# Altium PCB nrf_400708.PcbDoc (part 1 of 6)
Units mm, origin at the board's own origin, x right, y up, seen from the top; angles counter-clockwise.
Board outline 117 x 63.5 mm, 4 copper layers (Top Layer, Mid-Layer 1, Mid-Layer 2, Bottom Layer), stack 1.556 mm thick; 226 components, 168 nets, 912 pads, 2002 vias.
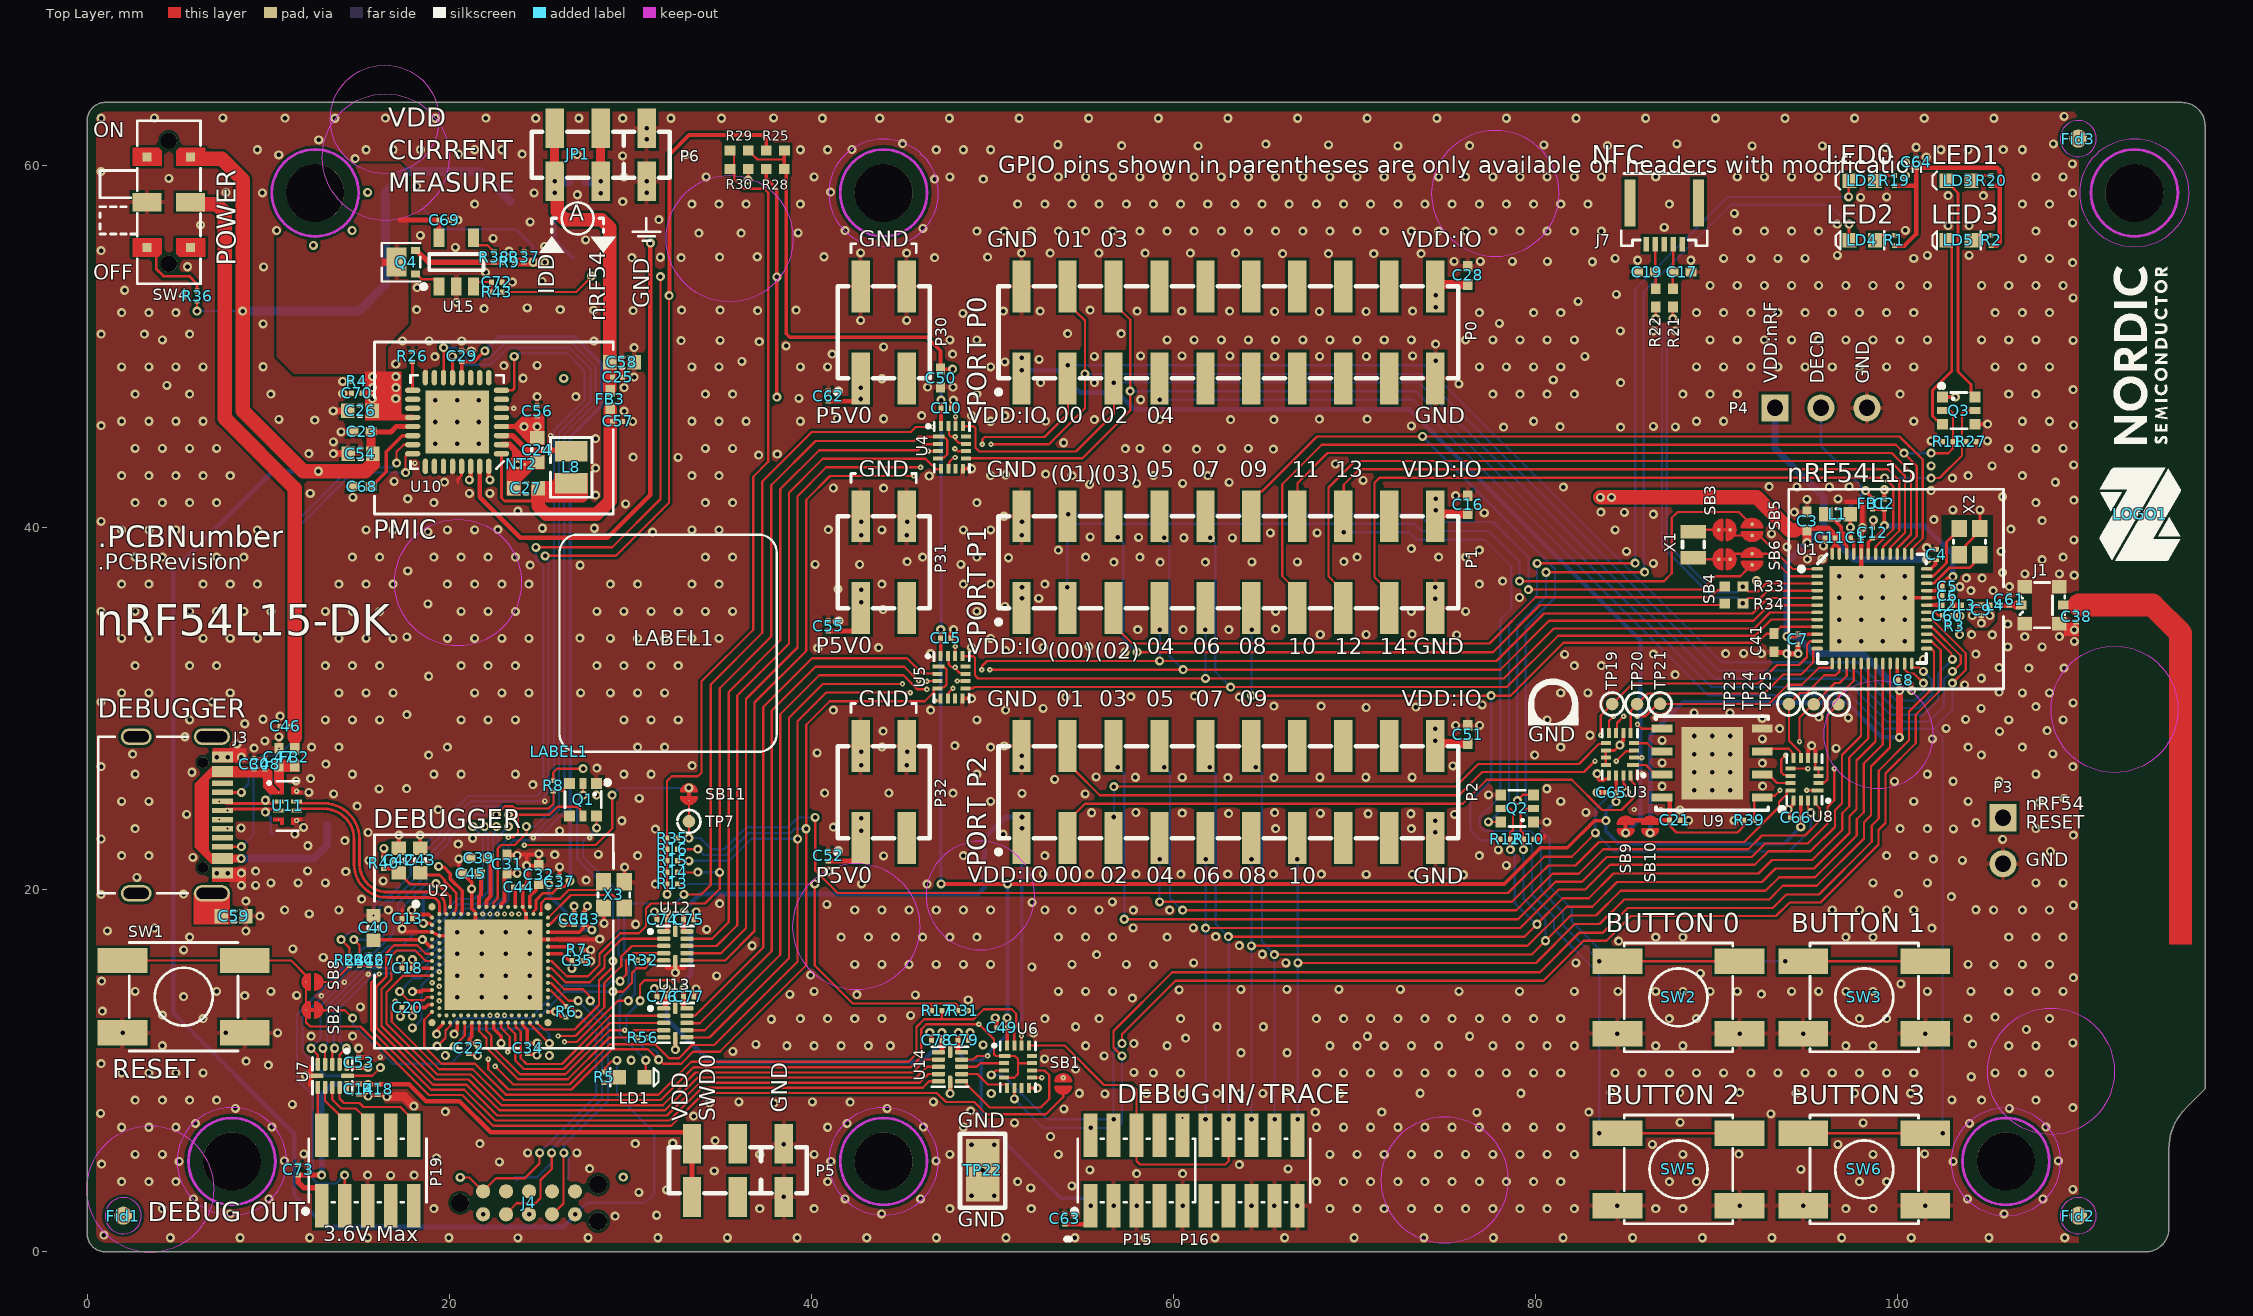
[diagram p0: Top Layer view]
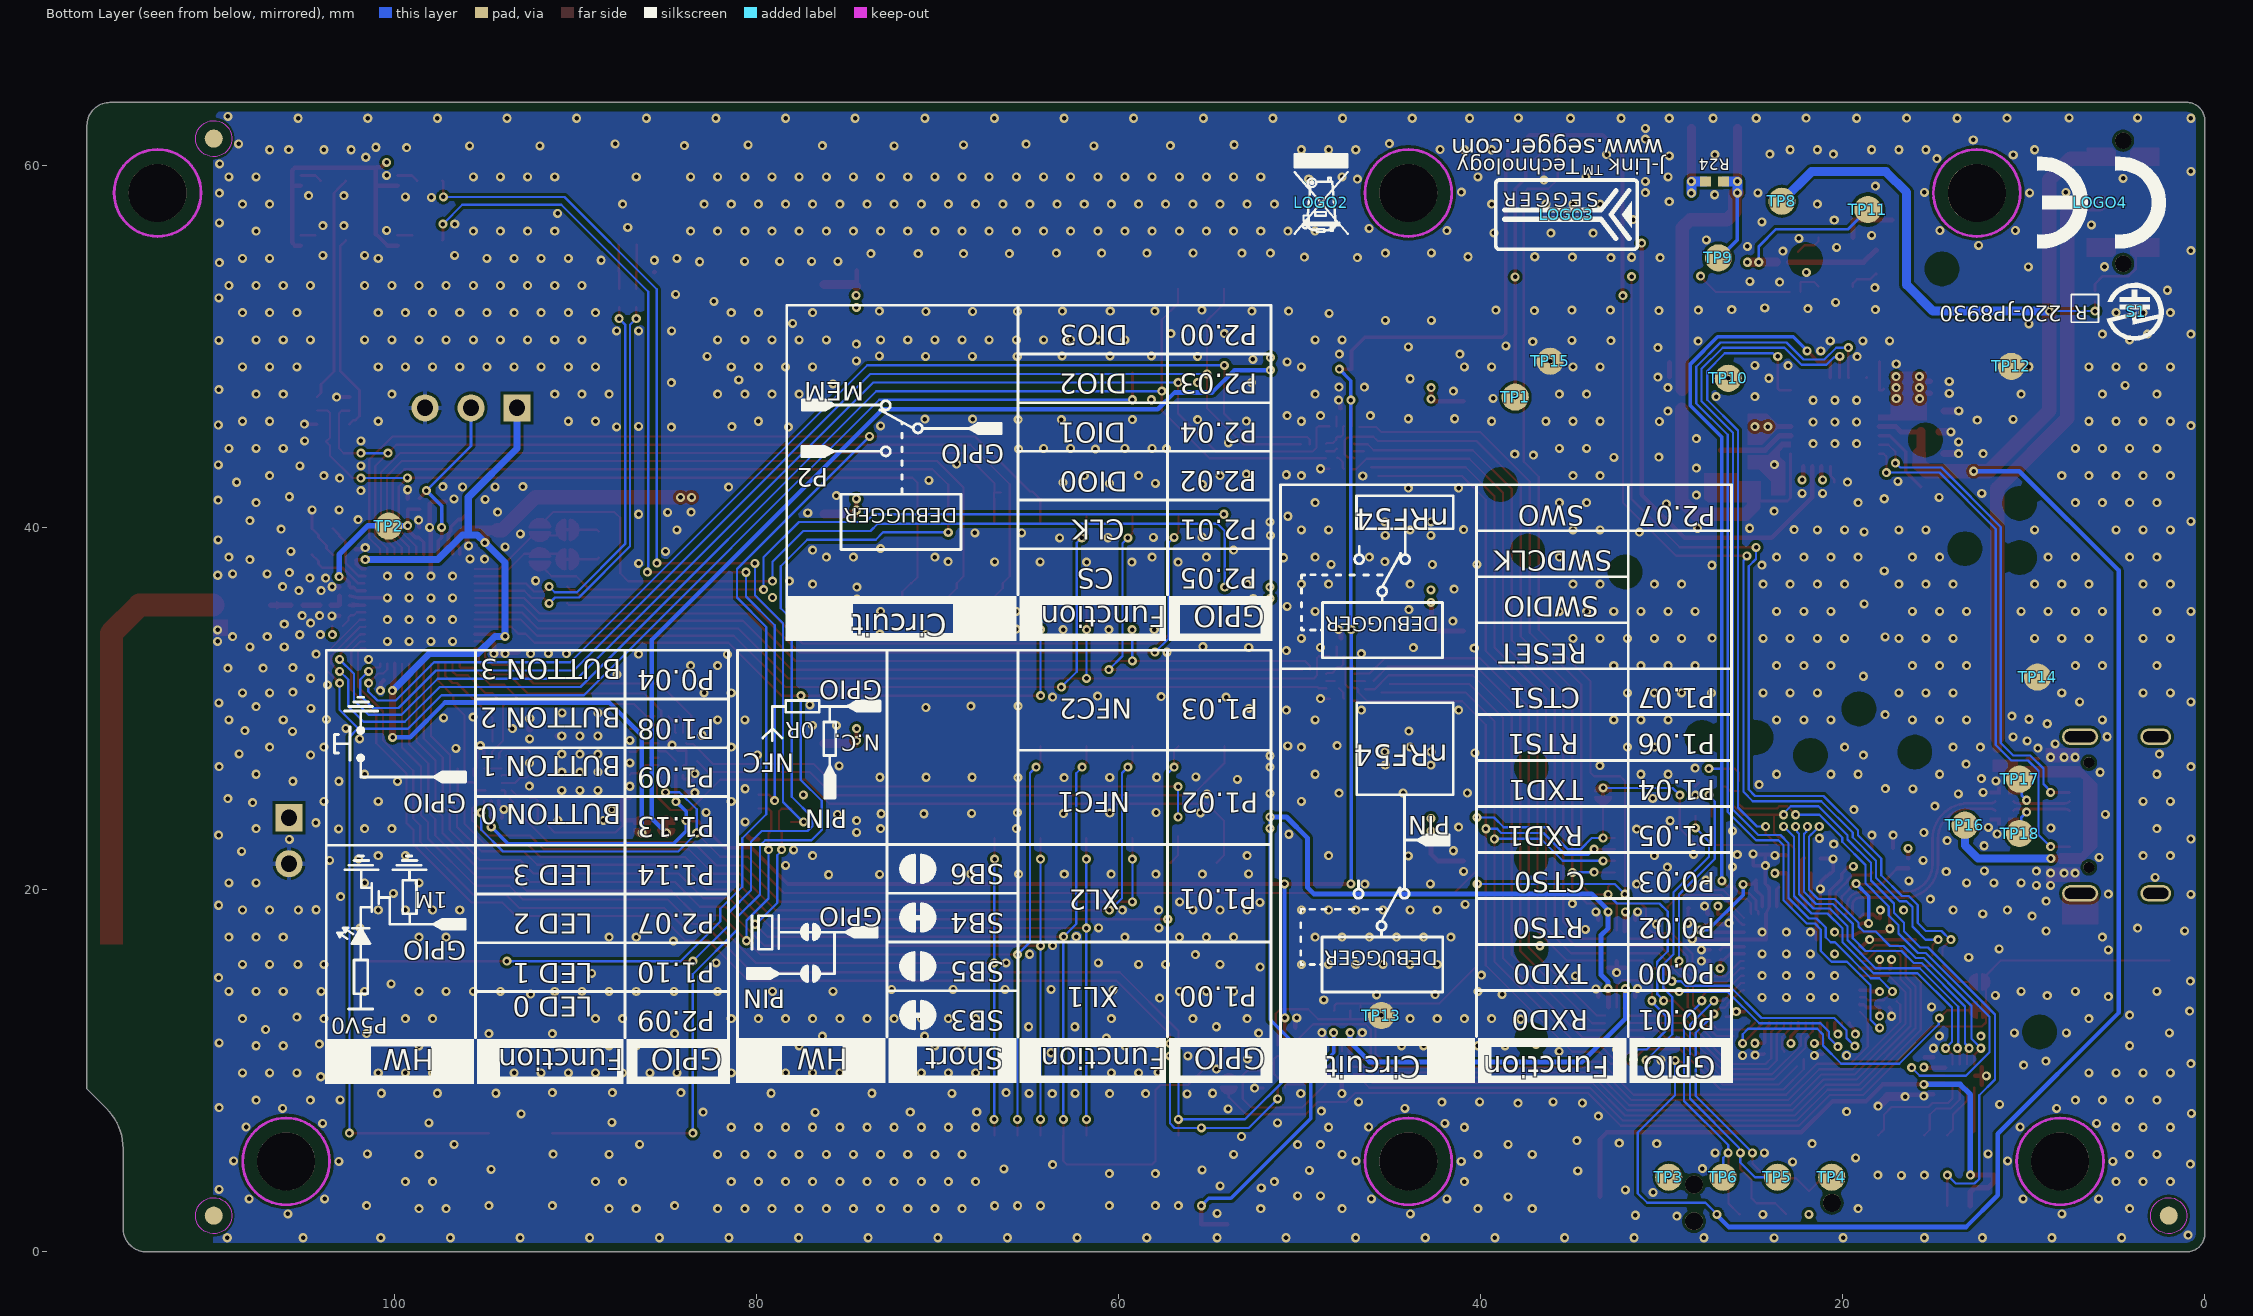
[diagram p1: Bottom Layer view, seen from below]
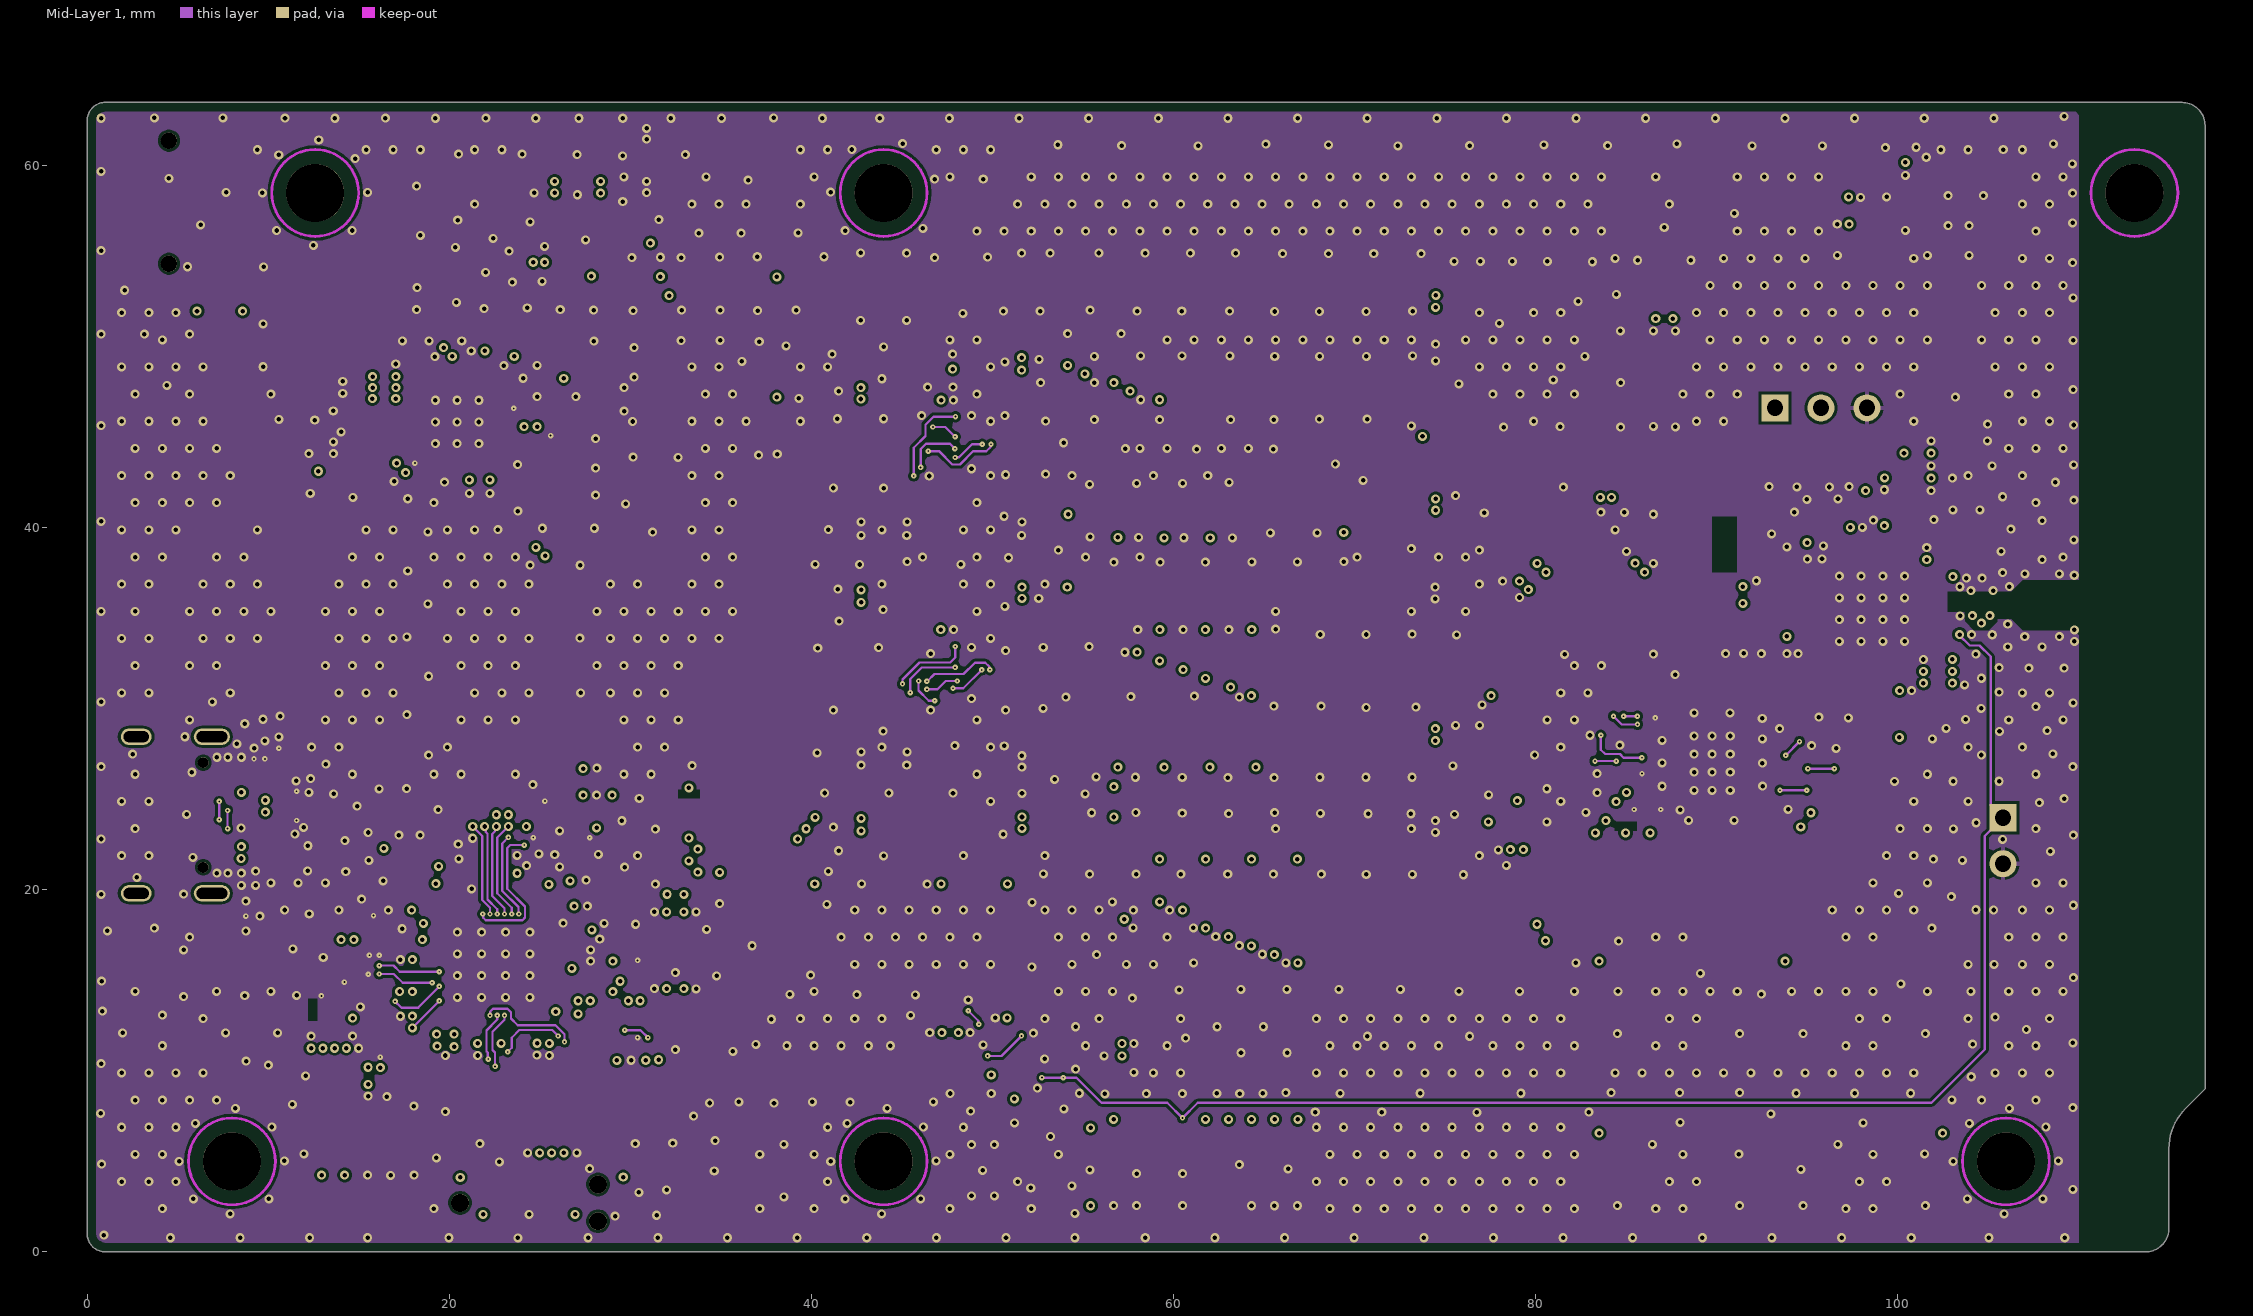
[diagram p2: Mid-Layer 1]
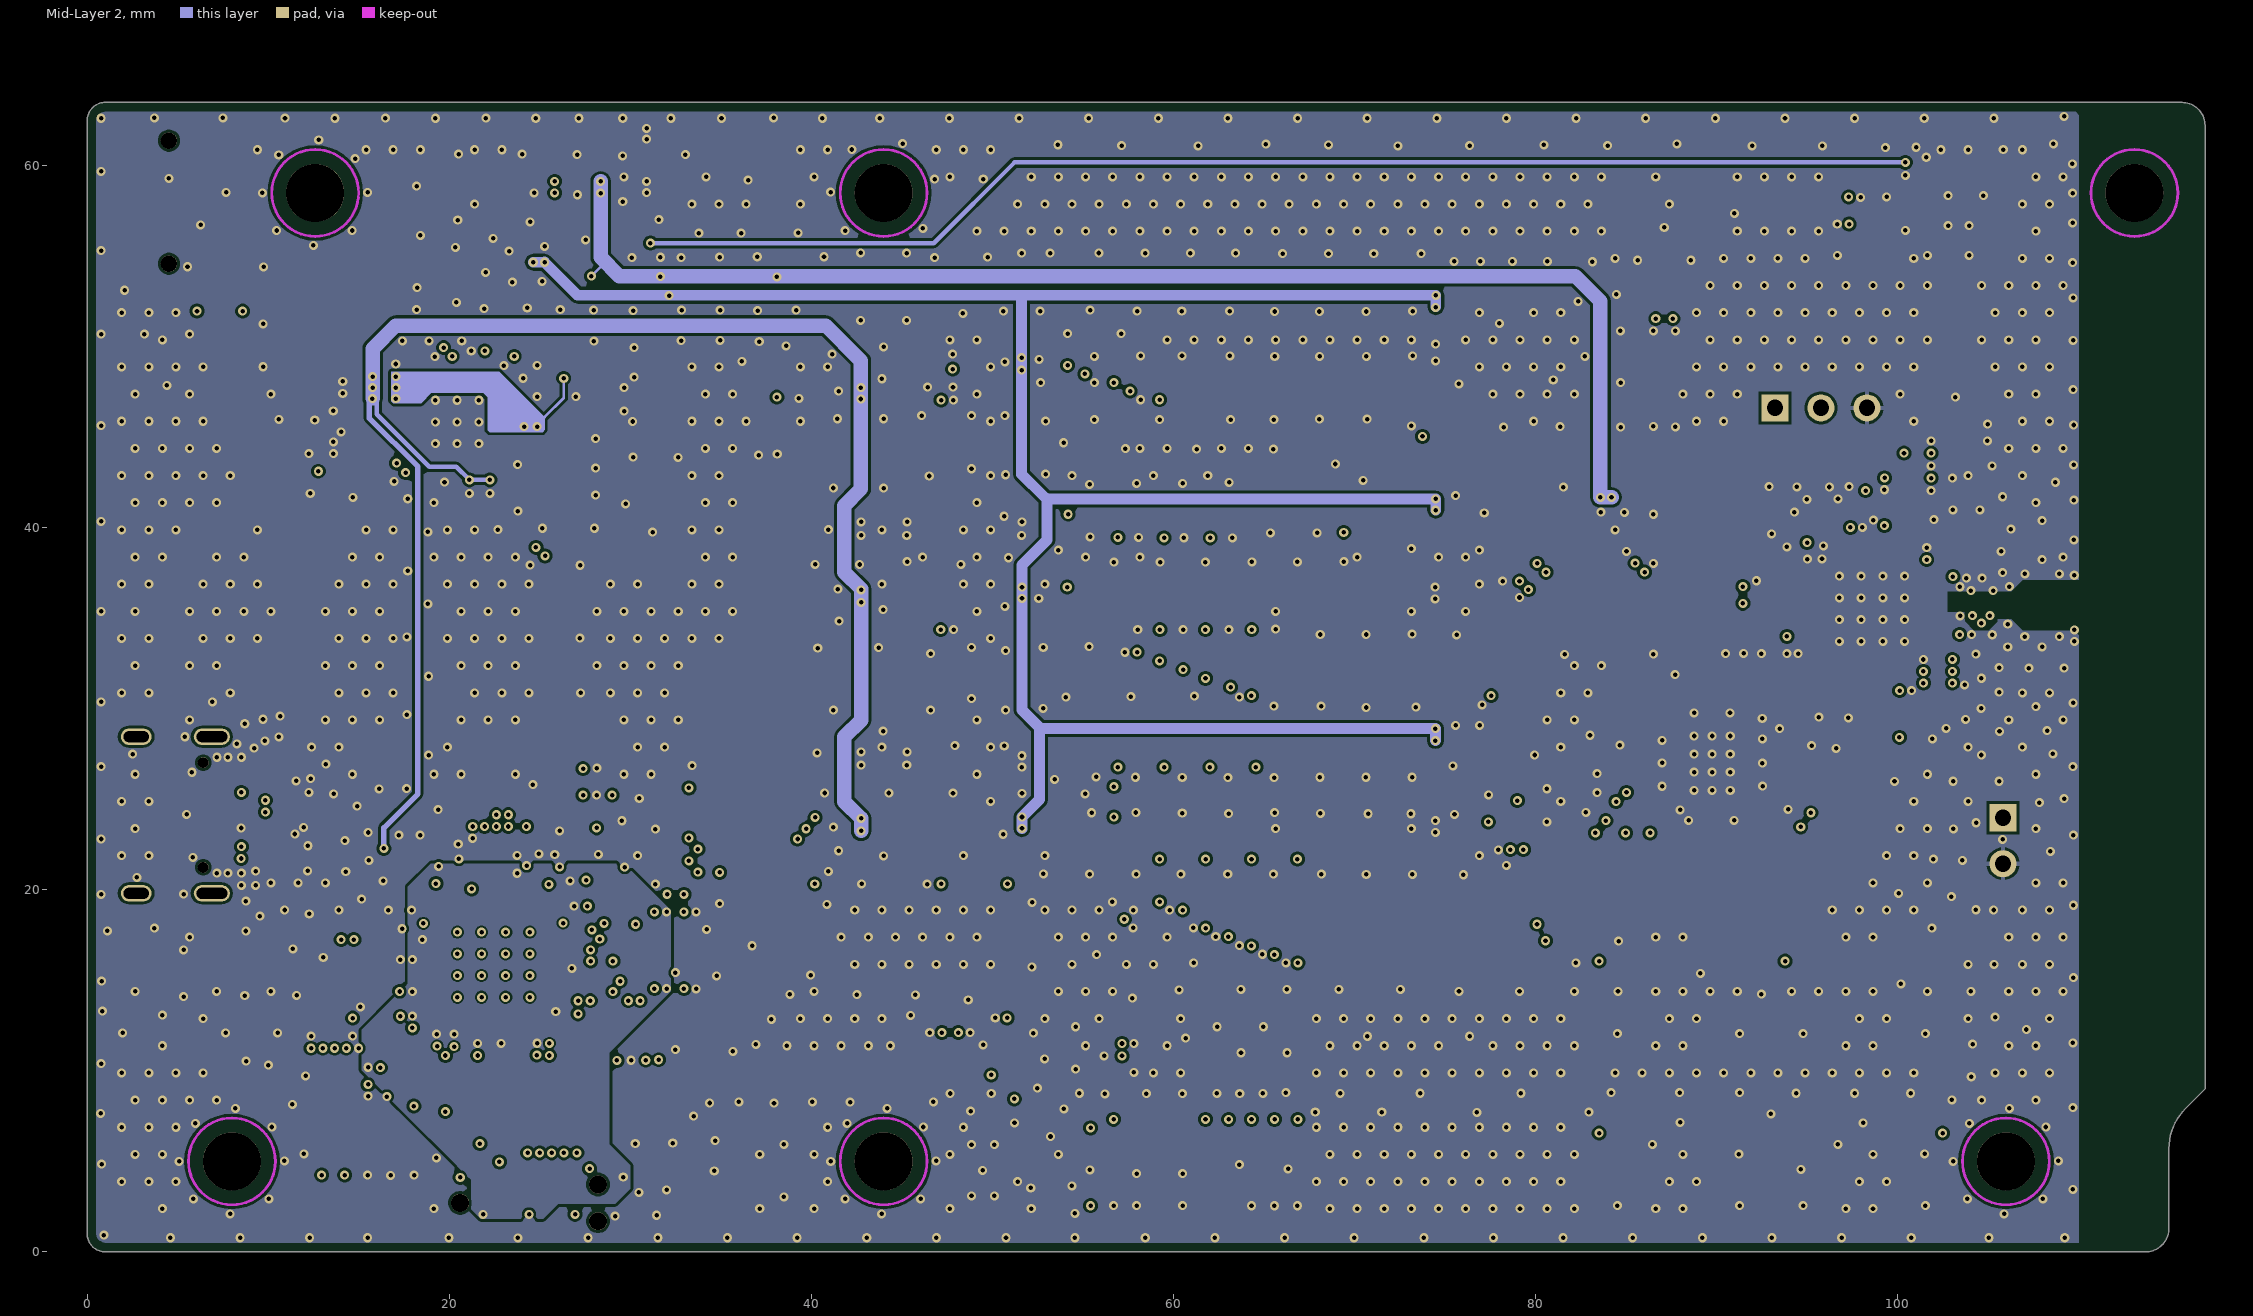
[diagram p3: Mid-Layer 2]
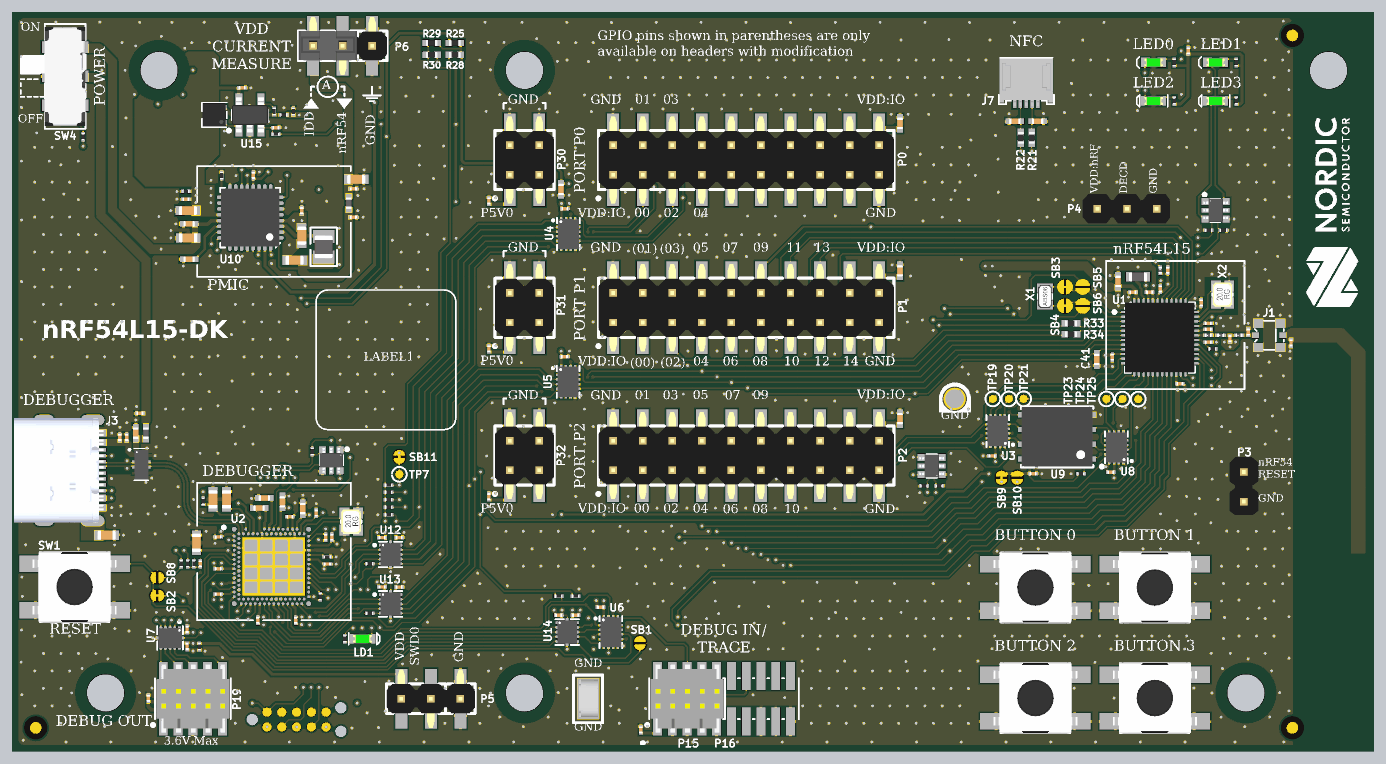
[diagram p7: 3D render of the assembled board from above, using the file's embedded part models]

## Layer stack, top to bottom
Top Solder: solder mask 0.0102, Solder Resist, Dk 3.5
Top Layer: signal copper 0.048
Dielectric 1: prepreg 0.1, PP-021, Dk 4.2
Mid-Layer 1: signal copper 0.03
Dielectric 2: core 1.2, Core-042, Dk 4.2
Mid-Layer 2: signal copper 0.03
Dielectric 3: prepreg 0.1, PP-021, Dk 4.2
Bottom Layer: signal copper 0.048
Bottom Solder: solder mask 0.0102, Solder Resist, Dk 3.5

## Board outline
1.016,0 cw(c1.016,1.016) 0,1.016 0,62.484 cw(c1.016,62.484) 1.016,63.5 115.734,63.5 cw(c115.734,62.23) 117.004,62.23 117.004,9 115.92,7.916 ccw(c118.132,5.705) 115.004,5.705 115.004,1.295 cw(c113.709,1.295) 113.709,0

## Design rules (kind name [scope] priority, off if disabled: settings)
AssemblyTestPointUsage [All] p1 off:
AssemblyTestpoint [All] p1 off: testpointundercomponent=TRUE minsize=1.016 maxsize=2.54 preferedsize=1.524 minholesize=0 maxholesize=1.016 preferedholesize=0.813 testpointgrid=0.025 usegrid=TRUE gridtolerance=0 allowsidetop=TRUE allowsidebottom=TRUE
BoardOutlineClearance [All] p1: gap=0.508 ignorepadtopadclearanceinfootprint=FALSE except(0: Arc-SplitContinuation Track-SplitContinuation SMDPad-SplitContinuation THPad-SplitContinuation Via-SplitContinuation Fill-SplitContinuation Poly-SplitContinuation Region-SplitContinuation Text-SplitContinuation)
Clearance ANT_Clearance [InNet('ANT') or InNet('RF') or InNet('NetC9_2') or InNet('NetC6_2')] p1: gap=0.16 ignorepadtopadclearanceinfootprint=FALSE
Clearance Polygon_Clearance [(InNamedPolygon('Mid_Layer1-GND')) or (InNamedPolygon('Bottom_Layer-GND')) or (InNamedPolygon('Mid_Layer2-GND')) or (InNamedPolygon('Top_Layer-GND'))] p2: gap=0.15 ignorepadtopadclearanceinfootprint=FALSE
Clearance Clearance_IMCU [WithinRoom('nRF5340')] p3: gap=0.1 ignorepadtopadclearanceinfootprint=FALSE
Clearance DiffPair_Clearance [InNetClass('IMCU_USB')] p4: gap=0.127 ignorepadtopadclearanceinfootprint=FALSE
Clearance [All] p5: gap=0.15 ignorepadtopadclearanceinfootprint=FALSE except(0.25: THPad-Region)
ComponentClearance [All] p1 off: gap=0.254 collisioncheckmode=3 verticalgap=0.254 showdistances=FALSE
DiffPairsRouting [InDifferentialPairClass('All Differential Pairs')] p1: maxlimit=0.15 minlimit=0.15 mostfreqgap=0.15 toplayer_minwidth=0.125 toplayer_maxwidth=0.153 toplayer_prefwidth=0.153 midlayer1_minwidth=0.125 midlayer1_maxwidth=0.153 midlayer1_prefwidth=0.125 midlayer4_minwidth=0.125 midlayer4_maxwidth=0.153 midlayer4_prefwidth=0.125 bottomlayer_minwidth=0.125 bottomlayer_maxwidth=0.153 bottomlayer_prefwidth=0.153 maxuncoupledlength=10
FabricationTestPointUsage TestPointUsage [All] p1 off: valid=2 allowmultiple=FALSE
FabricationTestpoint Testpoint [All] p1 off: side=2 testpointundercomponent=TRUE minsize=1.016 maxsize=2.54 preferedsize=1.524 minholesize=0 maxholesize=1.016 preferedholesize=0.813 testpointgrid=2.54 allowsidebottom=TRUE usegrid=TRUE gridtolerance=0
Height [All] p1 off: minheight=0 maxheight=25.4 prefheight=12.7
HoleSize [All] p1: absolutevalues=TRUE maxlimit=5 minlimit=0.1 maxpercent=80.000 minpercent=20.000
HoleToHoleClearance [IsThruVia] p1: gap=0.35 allowstackedmicrovias=FALSE
LayerPairs [All] p1 off: enforce=TRUE
MatchedLengths "Schematic Matched Net Lengths" [InNetClass('TRACE')] p1: tolerance=25.4 checknetsindiffpair=FALSE checkdiffpairvsdiffpair=TRUE checkxsignals=TRUE checkothers=TRUE usedelayunits=TRUE delaytolerance=500.000000
MatchedLengths MatchedLengths-Diffpairs [InDifferentialPairClass('All Differential Pairs')] p2: tolerance=1.27 checknetsindiffpair=TRUE checkdiffpairvsdiffpair=FALSE checkxsignals=FALSE checkothers=FALSE
MinimumAnnularRing [All] p1 off: minimumring=0.1
MinimumSolderMaskSliver [All] p1: minsoldermaskwidth=0.09
NetAntennae [All] p1 off: netantennaetolerance=0.3
PolygonConnect PolygonConnect_TP [HasFootprint('TP_SMD_D1.5mm') vs InNet('GND')] p1: connectstyle=Direct reliefconductorwidth=0.254 reliefentries=4 polygonreliefangle="90 Angle" airgapwidth=0.254
PolygonConnect PolygonConnect_SMT_Pads [HasFootprint('COAXIAL-SWF') or InComponent('C9') or InComponent('C61') or InComponent('TP22') or InComponent('U9') vs InNet('GND')] p2: connectstyle=Direct reliefconductorwidth=0.254 reliefentries=4 polygonreliefangle="90 Angle" airgapwidth=0.254
PolygonConnect [All] p3: thpad.connectstyle=Relief thpad.reliefconductorwidth=0.254 thpad.reliefentries=4 thpad.polygonreliefangle="90 Angle" thpad.airgapwidth=0.15 smdpad.connectstyle=Relief smdpad.reliefconductorwidth=0.254 smdpad.reliefentries=4 smdpad.polygonreliefangle="90 Angle" smdpad.airgapwidth=0.15 via.connectstyle=Direct via.reliefconductorwidth=0.254 via.reliefentries=4 via.polygonreliefangle="90 Angle" via.airgapwidth=0.254
RoomDefinition nRF5340 [False vs False] p1: confinementstyle=ConfineIn formatcopy=TRUE lockcomponents=FALSE outline 18.183,19.99 27.124,19.99 27.124,11.213 18.183,11.213
RoutingVias RoutingVias_Blind [IsBlindVia or IsMicroVia] p1: holewidth=0.711 width=1.27 viastyle="Through Hole" minholewidth=0.711 minwidth=1.27 maxholewidth=0.711 maxwidth=1.27 useviatemplates=TRUE viatemplateguid#1={B6F7EE11-84B8-42C4-BDC0-4B8B407402DD} viatemplatename#1=v30h10m0
RoutingVias RoutingVias_thru [IsThruVia] p2: holewidth=0.305 width=0.61 viastyle="Through Hole" minholewidth=0.305 minwidth=0.61 maxholewidth=0.711 maxwidth=1.27 useviatemplates=TRUE viatemplateguid#1={462064FF-42C7-473E-A651-561C1576AFDF} viatemplateguid#2={E64AB874-45CE-4CC8-95DD-841B5CDF8BA9} viatemplatename#1=v50h25m0mx0 viatemplatename#2=v50h25m0mx0(1)
ShortCircuit ShortCircuit_P15_P16 [InComponent('P15') vs InComponent('P16')] p1: allowed=TRUE
ShortCircuit ShortCircuit_PSS [InNet('PVSS1') or InNet('PVSS2') vs InNet('GND')] p2: allowed=TRUE
ShortCircuit [All] p3: allowed=FALSE
SignalStimulus [All] p1: kind=1 level=0 starttime=10.00n stoptime=250.0n periodtime=150.0n
SilkToSilkClearance [All] p1 off: silktosilkclearance=0.254
SilkToSolderMaskClearance SilkscreenOverComponentPads [IsPad] p1 off: minsilkscreentomaskgap=0.254 clearancetoexposedcopper=TRUE
SolderMaskExpansion SolderMaskExpansion_XFDFN40 [HasFootprint('XFDFN40P180X120X40-8M')] p1: expansion=0.02 istentingtop=FALSE
SolderMaskExpansion SolderMaskExpansion_footprints [HasFootprint('UDFN65P200X200X60_HS-6N') or HasFootprint('SON50P300X80-HS-11N') or HasFootprint('US8') or HasFootprint('SON50P300X80_HS-9N') or HasFootprint('BGA25C40P5X5_200X200X50') or HasFootprint('QFN40P180X140X55-10N') or HasFootprint('DX07S016JA1R1500') or HasFootprint('AQFN40P700X700X85_HS-99N') or HasFootprint('Nordic_QFN50P500X500X90-33N') or HasFootprint('QFN12P40_170X200X55L50X20')] p2: expansion=0.03 istentingtop=FALSE
SolderMaskExpansion SolderMaskExpansion_VIA [IsVia] p3: expansion=0.076 istentingtop=TRUE
SolderMaskExpansion [All] p4: expansion=0.05 istentingtop=FALSE
SupplyNets "Schematic Supply Nets" [InNet('VDD:IO')] p1: voltage=0.000
SupplyNets "Schematic Supply Nets_1" [InNet('VBUS')] p2: voltage=0.000
SupplyNets "Schematic Supply Nets_15" [InNet('VDD:SW')] p3: voltage=0.000
SupplyNets "Schematic Supply Nets_14" [InNet('VDD:DBGR')] p4: voltage=0.000
SupplyNets "Schematic Supply Nets_10" [InNet('VDD:SWD0')] p5: voltage=0.000
SupplyNets "Schematic Supply Nets_9" [InNet('VDD:nRF')] p6: voltage=0.000
SupplyNets "Schematic Supply Nets_7" [InNet('VDD:SW_PU')] p7: voltage=0.000
SupplyNets "Schematic Supply Nets_13" [InNet('VDD')] p8: voltage=0.000
SupplyNets "Schematic Supply Nets_12" [InNet('P5V0')] p9: voltage=0.000
SupplyNets "Schematic Supply Nets_11" [InNet('GND')] p10: voltage=0.000
SupplyNets "Schematic Supply Nets_3" [InNet('PVSS1')] p11: voltage=0.000
SupplyNets "Schematic Supply Nets_2" [InNet('VBUSOUT')] p12: voltage=0.000
Width Width_IMCU [OnTopLayer and HasFootprint('BGA144C35P12X12_450X420X100-A8-M3')] p1: maxlimit=2.5 minlimit=0.1 preferedwidth=0.15
Width [All] p2: maxlimit=2.5 minlimit=0.125 preferedwidth=0.15
15 further rules are at their usual default settings.

## Classes and differential pairs
component class Switches: C65 C66 R35 SB11 TP7 TP19 TP20 TP21 TP23 TP24 TP25 U3 U8
net class UART1: P1.04 P1.05 P1.06 P1.07
net class UART0: P0.00 P0.01 P0.02 P0.03
net class SWD_nRF54: nRF54_RESET P2.07 SWDCLK SWDIO
net class QSPI: P2.00_B P2.01_B P2.02_B P2.03_B P2.04_B P2.05_B
net class NFC: P1.02/NFC1 P1.03/NFC2
net class LEDS: P1.10 P1.14 P2.07 P2.09
net class GPIO_P2: P2.00 P2.01 P2.02 P2.03 P2.04 P2.05 P2.06 P2.07 P2.08 P2.09 P2.10
net class GPIO_P1: P1.00 P1.01 P1.02/NFC1 P1.03/NFC2 P1.04 P1.05 P1.06 P1.07 P1.08 P1.09 P1.10 P1.11 P1.12 P1.13 P1.14
net class GPIO_P0: P0.00 P0.01 P0.02 P0.03 P0.04
net class BUTTONS: P0.04 P1.08 P1.09 P1.13
differential pair class DBGR: DBGR DBGR'
net class DBGR_USB: DBGR'_N DBGR'_P DBGR_N DBGR_P
net class TRACE: P2.06 P2.07 P2.08 P2.09 P2.10
component class "Power supply": C23 C24 C25 C26 C27 C29 C56 C57 C58 C68 C69 C70 C72 FB3 JP1 L8 NT2 P6 Q4 R4 R24 R26 R38 R43 TP8 TP9 TP10 TP11 TP12 TP13 TP14 TP15 U10 U15
component class "Levelshifters and switches": C10 C14 C15 C49 C50 C53 C74 C75 C76 C77 C78 C79 R8 R13 R14 R15 R16 R17 R18 R25 R28 R29 R30 R31 U4 U5 U6 U7 U12 U13 U14
component class nRF54L15: C1 C2 C3 C4 C5 C6 C7 C8 C9 C11 C12 C38 C41 C60 C61 FB1 J1 L1 L2 L3 L4 P3 P4 R3 R33 R34 SB3 SB4 SB5 SB6 TP1 TP2 U1 X1 X2
component class Debugger: C13 C18 C20 C22 C31 C32 C33 C34 C35 C36 C37 C39 C40 C42 C43 C44 C45 C67 J4 LD1 Q1 R5 R6 R7 R32 R40 R41 R42 R56 TP3 TP4 TP5 TP6 U2 X3
component class Misc: C17 C19 C21 C64 LD2 LD3 LD4 LD5 Q2 Q3 R1 R2 R10 R11 R12 R19 R20 R21 R22 R23 R27 R39 SB8 SB9 SB10 SW1 SW2 SW3 SW5 SW6 U9
component class Connectors: C16 C28 C30 C46 C47 C48 C51 C52 C54 C55 C59 C62 C63 C73 FB2 J3 J7 P0 P1 P2 P5 P15 P16 P19 P30 P31 P32 R36 SW4 TP16 TP17 TP18 TP22 U11
component class pca10156_sheet1_connections: Fid1 Fid2 Fid3 LABEL1 LOGO1 LOGO2 LOGO3 LOGO4 S1 SB1 SB2
differential pair DBGR: +DBGR_P -DBGR_N
differential pair DBGR': +DBGR'_P -DBGR'_N

## Components (designator, comment, footprint, x,y, rotation, side; value= is the part's Value field where it differs from the comment)
C1 "2.2µF" CAPC0603X03L_C 97.72,39.439 r180 top
C2 "2.2µF" CAPC0603X03L_C 99.294,41.317 r270 top
C3 "10µF" CAPC1005X04L 95.017,40.367 r270 top
C4 "100nF" CAPC0603X03L_C 102.164,38.523 r90 top
C5 "2.2nF" CAPC0603X03L_C 102.773,36.75 r180 top
C6 "1.5pF" CAPC0603X03L_C 102.773,36.25 r0 top
C7 "100nF" CAPC0603X03L_C 94.518,33.849 r270 top
C8 "100nF" CAPC0603X03L_C 100.325,31.575 r0 top
C9 "2.0pF" CAPC0603X03L_C 104.635,35.445 r90 top
C10 "100nF" CAPC0603X03L_C 47.467,46.607 r0 top
C11 "100nF" CAPC0603X03L_C 96.285,39.439 r180 top
C12 "10nF" CAPC0603X03L_C 98.633,39.717 r90 top
C13 "100nF" CAPC0603X03L_C 17.689,18.401 r180 top
C14 "100nF" CAPC0603X03L_C 15.004,8.992 r270 top
C15 "100nF" CAPC0603X03L_C 47.433,33.903 r0 top
C16 "1.0µF" CAPC1005X04L 76.275,41.275 r270 top
C17 "300pF" CAPC1005X04L 88.104,54.123 r0 top
C18 "100nF" CAPC0603X03L_C 17.689,15.659 r180 top
C19 "300pF" CAPC1005X04L 86.152,54.123 r0 top
C20 "100nF" CAPC0603X03L_C 17.689,13.499 r180 top
C21 "100nF" CAPC0603X03L_C 87.707,23.842 r0 top
C22 "100nF" CAPC0603X03L_C 21.092,11.239 r270 top
C23 "2.2µF" CAPC1005X04L 15.184,45.313 r0 top
C24 "10µF" CAPC1608X06L 24.867,44.296 r90 top
C25 "100nF" CAPC0603X03L_C 29.305,48.321 r180 top
C26 "10µF" CAPC1608X06L 15.082,46.456 r0 top
C27 "10µF" CAPC1608X06L 24.249,42.186 r0 top
C28 "1.0µF" CAPC1005X04L 76.275,53.95 r270 top
C29 "100nF" CAPC0603X03L_C 20.7,49.475 r90 top
C30 "10nF" CAPC0603X03L_C 9.225,26.95 r90 top
C31 "1.0µF" CAPC1005X04L 23.2,21.424 r90 top
C32 "1.0µF" CAPC1005X04L 24.953,20.84 r270 top
C33 "2.2nF" CAPC0603X03L_C 27.459,18.376 r90 top
C34 "100nF" CAPC0603X03L_C 24.343,11.239 r270 top
C35 "100nF" CAPC0603X03L_C 27.068,16.078 r0 top
C36 "100nF" CAPC0603X03L_C 26.909,18.376 r270 top
C37 "100nF" CAPC0603X03L_C 26.096,20.459 r90 top
C38 "1.4pF" CAPC0603X03L_C 109.88,35.08 r90 top
C39 "1.0µF" CAPC1005X04L 21.651,21.754 r0 top
C40 "2.2µF" CAPC1608X06L 15.825,17.9 r90 top
C41 "100nF" CAPC1005X04L 93.186,33.655 r90 top
C42 "4.7µF" CAPC1608X06L 17.231,21.627 r90 top
C43 "4.7µF" CAPC1608X06L 18.4,21.627 r90 top
C44 "100nF" CAPC0603X03L_C 23.835,20.154 r0 top
C45 "1.0µF" CAPC1005X04L 21.194,20.891 r0 top
C46 "100nF" CAPC0603X03L_C 10.95,29.025 r0 top
C47 "1.0µF" CAPC1005X04L 10.6,27.325 r270 top
C48 "100nF" CAPC0603X03L_C 9.825,26.95 r270 top
C49 "100nF" CAPC0603X03L_C 50.54,12.369 r180 top
C50 "1.0µF" CAPC1005X04L 47.15,48.269 r90 top
C51 "1.0µF" CAPC1005X04L 76.275,28.576 r270 top
C52 "100nF" CAPC0603X03L_C 40.95,21.875 r270 top
C53 "100nF" CAPC0603X03L_C 15.004,10.459 r270 top
C54 "4.7µF" CAPC1608X06L 15.1,44.1 r180 top
C55 "100nF" CAPC0603X03L_C 40.95,34.575 r270 top
C56 "100nF" CAPC0603X03L_C 24.867,46.446 r270 top
C57 "100nF" CAPC0603X03L_C 29.305,45.874 r180 top
C58 "4.7µF" CAPC1608X06L 29.55,49.139 r0 top
C59 "10nF" CAPC1608X06L 8.1,18.552 r0 top
C60 "3.9pF" CAPC0603X03L_C 102.773,35.149 r0 top
C61 "0.3pF" CAPC0603X03L_C 106.2,36.015 r270 top
C62 "100nF" CAPC0603X03L_C 40.95,47.275 r270 top
C63 "100nF" CAPC0603X03L_C 54,1.825 r270 top
C64 "100nF" CAPC0603X03L_C 101.039,60.185 r270 top
C65 "100nF" CAPC0603X03L_C 84.193,25.365 r180 top
C66 "100nF" CAPC0603X03L_C 94.385,23.971 r180 top
C67 "10nF" CAPC0603X03L_C 16.145,16.1 r90 top
C68 "1.0µF" CAPC1005X04L 15.184,42.275 r0 top
C69 "100nF" CAPC0603X03L_C 19.735,57 r0 top
C70 "100nF" CAPC0603X03L_C 14.9,47.425 r0 top
C72 "100nF" CAPC0603X03L_C 22.635,53.575 r0 top
C73 "100nF" CAPC0603X03L_C 11.679,4.531 r270 top
C74 "100nF" CAPC0603X03L_C 31.766,18.354 r180 top
C75 "100nF" CAPC0603X03L_C 33.233,18.354 r0 top
C76 "100nF" CAPC0603X03L_C 31.766,14.104 r180 top
C77 "100nF" CAPC0603X03L_C 33.233,14.094 r0 top
C78 "100nF" CAPC0603X03L_C 46.939,11.679 r180 top
C79 "100nF" CAPC0603X03L_C 48.395,11.679 r0 top
FB1 "120R/0.2A" INDC0603X03L_C 98.633,41.317 r270 top
FB2 "120R/0.55A" INDC1005X04L 11.475,27.325 r90 top
FB3 "120R/0.55A" INDC1005X04L 28.905,47.096 r90 top
Fid1 "Fiducial mark" Fiducial 2,2 r0 top locked value=N.A.
Fid2 "Fiducial mark" Fiducial 110,2 r0 top locked value=N.A.
Fid3 "Fiducial mark" Fiducial 110,61.5 r0 top locked value=N.A.
J1 "MM8130-2600" COAXIAL-SWF 108.005,35.73 r90 top locked
J3 "USB-C 2.0" SD-80259-001 5.1,24.134 r270 top locked
J4 "TC2050-IDC" TC2050-IDC-NLFP 24.418,2.709 r0 top locked
J7 "FPC 0.5mm RA SMD" FPC_05P-0.5mm-RA-SMD 88.129,55.654 r180 top locked
JP1 "Shunt 2.54mm" Shunt_2.54mm_Vertical 27.113,60.625 r180 top
L1 "4.7µH" INDC1608X06L 96.728,40.758 r180 top
L2 "2.7nH" INDC0603X03L_C 102.773,35.73 r0 top
L3 "3.5nH" INDC0603X03L_C 103.83,35.73 r0 top
L4 "3.5nH" INDC0603X03L_C 105.406,35.73 r0 top
L8 "2.2µH" INDC2016X10N 26.749,43.336 r90 top locked
LABEL1 "12x12mm" LabelSilk_12x12 26.1,27.625 r0 top
LD1 "L0603G" LED_0603_G 30.103,9.652 r180 top
LD2 "L0603G" LED_0603_G 98.07,59.181 r0 top
LD3 "L0603G" LED_0603_G 103.404,59.181 r0 top
LD4 "L0603G" LED_0603_G 98.07,55.879 r0 top locked
LD5 "L0603G" LED_0603_G 103.404,55.879 r0 top locked
LOGO1 "Nordic Logo" NORDIC_LOGO_LYING 113.429,40.75 r90 top
LOGO2 "WEE Symbol" WEE_3x4.5mm 48.823,57.95 r0 bottom
LOGO3 "Segger Logo S" SEGGER_LOGO_S 35.267,57.301 r0 bottom
LOGO4 "CE Logo" CE_logo 5.771,57.97 r0 bottom
NT2 "Net tie" "2 PIN STARPOINT" 23.983,43.502 r180 top net-tie
P0 "Pin Hdr 2x10" HDR_2x10-SMD 63.054,50.8 r0 top
P1 "Pin Hdr 2x10" HDR_2x10-SMD 63.054,38.1 r0 top
P2 "Pin Hdr 2x10" HDR_2x10-SMD 63.054,25.4 r0 top
P3 "Pin List 1x2" LIST_1x2 105.845,22.713 r270 top
P4 "Pin List 1x3" LIST_1x3 95.785,46.625 r0 top locked
P5 "Pin List 1x3" LIST_1x3_SMD 38.5,4.5 r180 top locked
P6 "Pin List 1x3" LIST_1x3_SMD 30.912,60.606 r180 top locked
P15 "Pin Header 2x5, 1.27mm" HDR_2x5-SMD-1.27mm-K 57.978,4.5 r0 top locked
P16 "Pin Header 2x10, 1.27mm" HDR_2x10-SMD-1.27mm-NC 61.153,4.5 r0 top locked
P19 "Pin Header 2x5, 1.27mm" HDR_2x5-SMD-1.27mm-K 15.504,4.5 r0 top locked
P30 "Pin Header 2x2 SMD" HDR_2x2-SMD 44.004,50.8 r0 top
P31 "Pin Header 2x2 SMD" HDR_2x2-SMD 44.004,38.1 r0 top
P32 "Pin Header 2x2 SMD" HDR_2x2-SMD 44.004,25.4 r0 top
Q1 "NX138AKS" TSSOP6 27.401,24.983 r180 top
Q2 "NX138AKS" TSSOP6 79,24.5 r90 top
Q3 "NX138AKS" TSSOP6 103.4,46.475 r270 top
Q4 "PBSS4330PA" DFN105P200X65-3N_v2 17.35,54.675 r180 top
R1 "680R" RESC0603X03L_C 99.848,55.879 r270 top
R2 "680R" RESC0603X03L_C 105.182,55.879 r270 top
R3 "0R" RESC0603X03L_C 103.15,34.575 r0 top
R4 "10k" RESC0603X03L_C 14.9,48.091 r0 top
R5 "560R" RESC0603X03L_C 28.56,9.652 r90 top
R6 "100k" RESC0603X03L_C 26.46,13.271 r270 top
R7 "47R" RESC0603X03L_C 27.06,16.687 r0 top
R8 "100k" RESC0603X03L_C 25.76,25.74 r90 top
R9 "0R" RESC0603X03L_C 23.317,54.674 r0 top
R10 "1M0" RESC0603X03L_C 79.64,22.798 r0 top
R11 "1M0" RESC0603X03L_C 102.796,44.763 r180 top
R12 "1M0" RESC0603X03L_C 78.336,22.792 r180 top
R13 "100k" RESC0603X03L_C 32.325,20.325 r0 top
R14 "100k" RESC0603X03L_C 32.325,20.964 r0 top
R15 "100k" RESC0603X03L_C 32.325,21.605 r0 top
R16 "100k" RESC0603X03L_C 32.325,22.237 r0 top
R17 "100k" RESC0603X03L_C 46.939,13.325 r180 top
R18 "1M0" RESC0603X03L_C 16.064,8.977 r90 top
R19 "680R" RESC0603X03L_C 99.848,59.181 r270 top
R20 "680R" RESC0603X03L_C 105.182,59.181 r270 top
R21 "0R" RESC1005X04L 87.604,52.704 r90 top
R22 "0R" RESC1005X04L 86.661,52.704 r90 top
R23 "100k" RESC0603X03L_C 14.5,16.1 r90 top
R24 "TBD" RESC1005X04L 27.099,59.141 r180 bottom
R25 "0R" RESC1005X04L 38.025,60.85 r0 top
R26 "47k" RESC0603X03L_C 17.973,49.468 r90 top
R27 "1M0" RESC0603X03L_C 104.075,44.763 r0 top
R28 "0R" RESC1005X04L 38.019,59.83 r0 top
R29 "0R" RESC1005X04L 36.025,60.85 r0 top
R30 "0R" RESC1005X04L 36.025,59.83 r0 top
R31 "100k" RESC0603X03L_C 48.395,13.325 r0 top
R32 "100k" RESC0603X03L_C 30.7,16.1 r180 top
R33 "0R" RESC1005X04L 90.974,36.755 r180 top
R34 "0R" RESC1005X04L 90.974,35.83 r180 top
R35 "100k" RESC0603X03L_C 32.325,22.864 r180 top
R36 "1k" RESC0603X03L_C 6.075,52.8 r270 top
R37 "10k" RESC0603X03L_C 24.142,54.96 r270 top
R38 "0R" RESC0603X03L_C 22.485,54.96 r270 top
R39 "100k" RESC0603X03L_C 91.822,23.835 r180 top
R40 "2R2" RESC0603X03L_C 16.394,21.469 r90 top
R41 "10k" RESC0603X03L_C 15.053,16.099 r90 top
R42 "10k" RESC0603X03L_C 15.6,16.099 r270 top
R43 "33k" RESC0603X03L_C 22.635,53.025 r180 top
R56 "100k" RESC0603X03L_C 30.7,11.84 r180 top
S1 "Giteki Symbol" Giteki 3.788,51.95 r0 bottom
SB1 "Solderbridge" Solderbridge 53.925,9.275 r270 top
SB2 "Solderbridge" Solderbridge_Shorted 12.45,13.364 r0 top net-tie
SB3 "Solderbridge" Solderbridge_SHORTED_0.4 90.458,39.887 r180 top net-tie
SB4 "Solderbridge" Solderbridge_SHORTED_0.4 90.458,38.262 r180 top net-tie
SB5 "Solderbridge" Solderbridge_0.4#1 91.982,39.887 r90 top
SB6 "Solderbridge" Solderbridge_0.4#2 91.982,38.262 r270 top
SB8 "Solderbridge" Solderbridge 12.45,14.91 r0 top
SB9 "Solderbridge" Solderbridge_Shorted 84.997,23.492 r90 top net-tie
SB10 "Solderbridge" Solderbridge 86.347,23.492 r90 top
SB11 "Solderbridge" Solderbridge_Shorted 33.25,25.283 r270 top net-tie
SW1 "PB SW" Switch-PB-6.2x6.3mm-SMD 5.338,14.097 r180 top
SW2 "PB SW" Switch-PB-6.2x6.3mm-SMD 87.918,14.058 r180 top locked
SW3 "PB SW" Switch-PB-6.2x6.3mm-SMD 98.179,14.058 r180 top locked
SW4 "Switch" JS102011JAQN 4.521,57.988 r270 top locked
SW5 "PB SW" Switch-PB-6.2x6.3mm-SMD 87.918,4.558 r180 top locked
SW6 "PB SW" Switch-PB-6.2x6.3mm-SMD 98.179,4.558 r180 top locked
TP1 "Ø1.5mm,SMD" TP_SMD_D1.5mm#1 38.104,47.219 r90 bottom locked
TP2 "Ø1.5mm,SMD" TP_SMD_D1.5mm#1 100.339,40.093 r180 bottom locked
TP3 "Ø1.5mm,SMD" TP_SMD_D1.5mm#2 29.62,4.115 r180 bottom locked
TP4 "Ø1.5mm,SMD" TP_SMD_D1.5mm#2 20.616,4.115 r180 bottom locked
TP5 "Ø1.5mm,SMD" TP_SMD_D1.5mm#2 23.616,4.115 r180 bottom locked
TP6 "Ø1.5mm,SMD" TP_SMD_D1.5mm#2 26.616,4.115 r180 bottom locked
TP7 "Ø0.7mm,SMD" TP_SMD_D0.7mm 33.25,23.783 r0 top
TP8 "Ø1.5mm,SMD" TP_SMD_D1.5mm#1 23.372,58.039 r270 bottom locked
TP9 "Ø1.5mm,SMD" TP_SMD_D1.5mm#1 26.877,54.915 r270 bottom locked
TP10 "Ø1.5mm,SMD" TP_SMD_D1.5mm#1 26.334,48.26 r180 bottom locked
TP11 "Ø1.5mm,SMD" TP_SMD_D1.5mm#1 18.622,57.582 r90 bottom locked
TP12 "Ø1.5mm,SMD" TP_SMD_D1.5mm#1 10.693,48.92 r90 bottom locked
TP13 "Ø1.5mm,SMD" TP_SMD_D1.5mm#1 45.496,13.056 r90 bottom locked
TP14 "Ø1.5mm,SMD" TP_SMD_D1.5mm#1 9.25,31.75 r90 bottom locked
TP15 "Ø1.5mm,SMD" TP_SMD_D1.5mm#1 36.174,49.2 r90 bottom locked
TP16 "Ø1.5mm,SMD" TP_SMD_D1.5mm#1 13.263,23.571 r180 bottom locked
TP17 "Ø1.5mm,SMD" TP_SMD_D1.5mm#1 10.24,26.115 r180 bottom locked
TP18 "Ø1.5mm,SMD" TP_SMD_D1.5mm#1 10.24,23.113 r180 bottom locked
TP19 "Ø0.7mm,SMD" TP_SMD_D0.7mm 84.253,30.265 r90 top
TP20 "Ø0.7mm,SMD" TP_SMD_D0.7mm 85.628,30.265 r90 top
TP21 "Ø0.7mm,SMD" TP_SMD_D0.7mm 86.9,30.275 r90 top
TP22 "TP" S1751 49.475,4.5 r270 top locked
TP23 "Ø0.7mm,SMD" TP_SMD_D0.7mm 94.016,30.265 r90 top
TP24 "Ø0.7mm,SMD" TP_SMD_D0.7mm 95.391,30.25 r90 top
TP25 "Ø0.7mm,SMD" TP_SMD_D0.7mm 96.75,30.25 r90 top
U1 "nRF54L15-QFAA" QFN40P600X600X90-48N 98.605,35.53 r0 top locked
U2 "nRF5340-QKAA" AQFN40P700X700X85_HS-99N 22.26,15.864 r0 top locked
U3 "TMUX1574" XQFN40P180X260X50-16N#1 84.675,27.5 r180 top
U4 "TMUX1511" XQFN40P180X260X50-16N#2 47.778,44.437 r0 top
U5 "TMUX1511" XQFN40P180X260X50-16N#2 47.76,31.736 r0 top
U6 "TMUX1511" XQFN40P180X260X50-16N#2 51.425,10.225 r0 top
U7 "TXB0104" QFN12P40_170X200X55L50X20 13.55,9.725 r270 top
U8 "TMUX1574" XQFN40P180X260X50-16N#1 94.875,26.1 r180 top
U9 "MX25R6435F" SON127P600X80_HS-9N 89.775,27 r180 top locked
U10 "nPM1300-QEAAC0" Nordic_QFN50P500X500X90-33N 20.442,45.846 r180 top locked
U11 "ECMF02-4CMX8" UFDFN50P120X250X55-8N 11.079,24.633 r0 top
U12 "TXB0104" QFN12P40_170X200X55L50X20 32.5,16.9 r0 top
U13 "TXB0104" QFN12P40_170X200X55L50X20 32.5,12.65 r0 top
U14 "TXB0104" QFN12P40_170X200X55L50X20 47.675,10.225 r0 top
U15 "TLV271" SOT95P280X145-5N 20.4,54.675 r90 top
X1 "32.768kHz" XTAL_2012 88.739,39.068 r90 top
X2 "32MHz" BT-XTAL_2016 103.993,39.234 r90 top
X3 "32MHz" BT-XTAL_2016 29.106,19.719 r90 top locked

## Footprints (in the part's own frame and the unit in brackets; to place one, negate y for a bottom-side part, rotate by r counter-clockwise, add the part's x,y. Pads: shape width x height; smd on the part's side, far side on the other; paste and mask are expansions set on the pad)
"2 PIN STARPOINT" [mil]
  round 6 smd paste-196.85 mask-196.85: 1(8,0) 2(-8,0)
  Top Layer region: -8,-3 8,-3 8,3 -8,3
AQFN40P700X700X85_HS-99N [mm] "AQFN, 98-Leads, Body 7.00x7.00mm, Pitch 0.40mm, Thermal Pad 5.4x5.0mm, IPC Medium Density"
  rect 5.4x5 smd paste-5: 104(0.2,0)
  round 0.4 smd paste+0.012: A1(-3.2,3.2) A31(3.2,3.2) AL1(-3.2,-3.2) AL31(3.2,-3.2)
  round 0.225 smd paste+0.012: A5(-2.2,3.2) A13(-0.6,3.2) A15(-0.2,3.2) A17(0.2,3.2) A19(0.6,3.2) A21(1,3.2) A23(1.4,3.2) A25(1.8,3.2) A27(2.2,3.2) AA1(-3.2,-1) AA31(3.2,-1) AB2(-2.8,-1.2) AC1(-3.2,-1.4) AC31(3.2,-1.4) AD2(-2.8,-1.6) AE1(-3.2,-1.8) AE31(3.2,-1.8) AF2(-2.8,-2) AG1(-3.2,-2.2) AG31(3.2,-2.2) AH2(-2.8,-2.4) AJ1(-3.2,-2.6) AJ31(3.2,-2.6) AK2(-2.8,-2.8) AK4(-2.4,-2.8) AK6(-2,-2.8) AK8(-1.6,-2.8) AK10(-1.2,-2.8) AK12(-0.8,-2.8) AK14(-0.4,-2.8) AK16(0,-2.8) AK18(0.4,-2.8) AK20(0.8,-2.8) AK22(1.2,-2.8) AK24(1.6,-2.8) AK26(2,-2.8) AK28(2.4,-2.8) AK30(2.8,-2.8) AL3(-2.6,-3.2) AL5(-2.2,-3.2) AL7(-1.8,-3.2) AL9(-1.4,-3.2) AL11(-1,-3.2) AL13(-0.6,-3.2) AL15(-0.2,-3.2) AL17(0.2,-3.2) AL19(0.6,-3.2) AL21(1,-3.2) AL23(1.4,-3.2) AL25(1.8,-3.2) AL27(2.2,-3.2) AL29(2.6,-3.2) B2(-2.8,2.8) B4(-2.4,2.8) B6(-2,2.8) B8(-1.6,2.8) B10(-1.2,2.8) B12(-0.8,2.8) B14(-0.4,2.8) B16(0,2.8) B18(0.4,2.8) B20(0.8,2.8) B22(1.2,2.8) B24(1.6,2.8) B26(2,2.8) B28(2.4,2.8) B30(2.8,2.8) C1(-3.2,2.6) C31(3.2,2.6) D2(-2.8,2.4) E1(-3.2,2.2) E31(3.2,2.2) F2(-2.8,2) G1(-3.2,1.8) G31(3.2,1.8) H2(-2.8,1.6) J1(-3.2,1.4) J31(3.2,1.4) K2(-2.8,1.2) L1(-3.2,1) L31(3.2,1) M2(-2.8,0.8) N1(-3.2,0.6) N31(3.2,0.6) P2(-2.8,0.4) R1(-3.2,0.2) R31(3.2,0.2) T2(-2.8,0) U1(-3.2,-0.2) U31(3.2,-0.2) V2(-2.8,-0.4) W1(-3.2,-0.6) W31(3.2,-0.6) Y2(-2.8,-0.8)
  rrect15% 1.1x1 on Top Paste: ""(-1.75,-1.8) ""(-1.75,-0.6) ""(-1.75,0.6) ""(-1.75,1.8) ""(-0.45,-1.8) ""(-0.45,-0.6) ""(-0.45,0.6) ""(-0.45,1.8) ""(0.85,-1.8) ""(0.85,-0.6) ""(0.85,0.6) ""(0.85,1.8) ""(2.15,-1.8) ""(2.15,-0.6) ""(2.15,0.6) ""(2.15,1.8)
  silkscreen extent -4.22,3.23 -3.97,3.47, body extent -3.5,-3.5 3.5,3.5, height 0.85
BT-XTAL_2016 [mm] "Crystal 2.0 x 1.6 mm"
  rect 0.95x0.85 smd: 1(-0.725,-0.575) 2(0.725,-0.575) 3(0.725,0.575) 4(-0.725,0.575)
  silkscreen extent -0.1,-0.88 0.1,0.88, body extent -1.05,-0.85 1.05,0.85, height 0.56
CAPC0603X03L_C [mm] "Chip Capacitor, 2-Leads, Body 0.6x0.3mm, IPC High Density"
  rect 0.27x0.3 smd mask+0.05: 1(-0.285,0) 2(0.285,0)
  body extent -0.3,-0.15 0.3,0.15, height 0.3
CAPC1005X04L [mm] "Chip Capacitor, 2-Leads, Body 1.0x0.5mm, IPC High Density"
  rect 0.6x0.5 smd: 1(-0.5,0) 2(0.5,0)
  body extent -0.5,-0.25 0.5,0.25, height 0.5
CAPC1608X06L [mm] "Chip Capacitor, 2-Leads, Body 1.6x0.8mm, IPC High Density"
  rect 0.75x0.8 smd: 1(-0.675,0) 2(0.675,0)
  silkscreen extent -0.1,-0.3 0.1,0.3, body extent -0.8,-0.4 0.8,0.4, height 0.8
CE_logo [mm]
  silkscreen extent -3.6,-2.53 3.48,2.53
COAXIAL-SWF [mm]
  rect 0.5x0.58 smd: 1(0,1.16) 3(0,-1.16)
  rect 0.75x0.8 smd: 2(-1.025,-0.95) 2(-1.025,0.95) 2(1.025,-0.95) 2(1.025,0.95)
  Top Layer pour cut-out: 0.65,-0.55 -0.65,-0.55 -0.65,-1.35 0.65,-1.35
  Top Layer pour cut-out: -0.65,0.55 0.65,0.55 0.65,1.35 -0.65,1.35
  silkscreen extent -1.25,-1.25 1.25,1.23, body extent -1.26,-1.3 1.26,1.3, height 1.55
DFN105P200X65-3N_v2 [mm] "DFN, 3-Leads, Body 2.00x2.00mm, Pitch 1.05mm, IPC Medium Density"
  rect 0.5x0.4 smd: 1(-0.8,0.65) 2(-0.8,-0.65)
  rect 1.1x1.6 smd: 3(0.25,0)
  Top Layer region: 0.65,-0.2 1.05,-0.2 1.05,0.2 0.65,0.2
  silkscreen extent -1.2,-1.06 1.06,1.36, body extent -1,-1 1,1, height 0.65
Fiducial [mm] "Fiducial Mark"
  round 1 smd paste-2539.97 mask+0.5: 0(0,0)
  round 1 smd far side paste-2539.97 mask+0.5: 0(0,0)
  Top Layer keep-out circle w0.01: c0,0 r1
  Bottom Layer keep-out circle w0.01: c0,0 r1
FPC_05P-0.5mm-RA-SMD [mm] "FPC, 5-Leads, Pitch 0,5mm"
  rect 0.6x2.6 smd: 0(-0.9,-2.3) 0(2.9,-2.3)
  rect 0.3x0.8 smd mask+0.05: 1(0,0) 2(0.5,0) 3(1,0) 4(1.5,0) 5(2,0)
  silkscreen extent -1.38,-3.93 3.38,0.08, body extent -1.3,-3.85 3.3,0.2, height 1.2
Giteki [mm] "Japan certification mark"
  silkscreen extent -1.5,-1.59 3.6,1.6
HDR_2x2-SMD [mil] "Board-Board Conn, Header, 4-way, 2-row"
  rect 40x113 smd: 1(-50,-100) 2(-50,100) 3(50,-100) 4(50,100)
  silkscreen extent -105,-135 100,100, body extent -100,-148 100,148, height 382
HDR_2x5-SMD-1.27mm-K [mm] "SMT MICRO HEADER, (1,27) .050\" Keying Shroud"
  rect 0.76x2.4 smd: 1(-2.54,-1.95) 2(-2.54,1.95) 3(-1.27,-1.95) 4(-1.27,1.95) 5(0,-1.95) 6(0,1.95) 7(1.27,-1.95) 8(1.27,1.95) 9(2.54,-1.95) 10(2.54,1.95)
  silkscreen extent -3.56,-2.38 3.25,1.75, body extent -3.14,-2.92 3.14,2.92, height 6.11
HDR_2x10-SMD [mil] "Board-Board Conn, Header, 20-way, 2-row"
  rect 40x113 smd: 1(-450,-100) 2(-450,100) 3(-350,-100) 4(-350,100) 5(-250,-100) 6(-250,100) 7(-150,-100) 8(-150,100) 9(-50,-100) 10(-50,100) 11(50,-100) 12(50,100) 13(150,-100) 14(150,100) 15(250,-100) 16(250,100) 17(350,-100) 18(350,100) 19(450,-100) 20(450,100)
  silkscreen extent -505,-135 500,100, body extent -500,-148 500,148, height 382
HDR_2x10-SMD-1.27mm-NC [mm] "SMT MICRO HEADER, (1,27) .050\""
  rect 0.76x2.4 smd: 1(-5.715,-1.95) 2(-5.715,1.95) 3(-4.445,-1.95) 4(-4.445,1.95) 5(-3.175,-1.95) 6(-3.175,1.95) 7(-1.905,-1.95) 8(-1.905,1.95) 9(-0.635,-1.95) 10(-0.635,1.95) 11(0.635,-1.95) 12(0.635,1.95) 13(1.905,-1.95) 14(1.905,1.95) 15(3.175,-1.95) 16(3.175,1.95) 17(4.445,-1.95) 18(4.445,1.95) 19(5.715,-1.95) 20(5.715,1.95)
  silkscreen extent -6.73,-2.38 6.43,1.75
INDC0603X03L_C [mm] "Chip Inductor, 2-Leads, Body 0.6x0.3mm, IPC High Density"
  rect 0.27x0.3 smd: 1(-0.285,0) 2(0.285,0)
  body extent -0.3,-0.15 0.3,0.15, height 0.3
INDC1005X04L [mm] "Chip Inductor, 2-Leads, Body 1.0x0.5mm, IPC High Density"
  rect 0.65x0.5 smd: 1(-0.475,0) 2(0.475,0)
  body extent -0.5,-0.25 0.5,0.25, height 0.5
INDC1608X06L [mm] "Chip Inductor, 2-Leads, Body 1.6x0.8mm, IPC High Density"
  rect 0.75x0.8 smd: 1(-0.675,0) 2(0.675,0)
  silkscreen extent -0.1,-0.3 0.1,0.3, body extent -0.8,-0.4 0.8,0.4, height 0.8
INDC2016X10N [mm] "Chip Inductor, 2-Leads, Body 2.00x1.60mm, IPC Medium Density"
  rect 1.13x1.82 smd: 1(-0.885,0) 2(0.885,0)
  silkscreen extent -1.65,-1.14 1.65,1.14, body extent -1,-0.8 1,0.8, height 1
JS102011JAQN [mm] "Slide Switches - DPDT, SMD, ON-ON"
  round 0.9 hole 0.9 unplated mask+0: 0(-3.4,0) 0(3.4,0)
  rect 0.5x0.5 smd: 1(-2.5,-1.2) 3(2.5,-1.2) 4(-2.5,1.2) 6(2.5,1.2)
  rect 1x1.6 smd: 2(0,-1.2) 5(0,1.2)
  Top Layer region: 3,-0.562 2.838,-0.4 2,-0.4 2,-2 3,-2
  Top Layer region: 3,0.562 2.838,0.4 2,0.4 2,2 3,2
  Top Layer region: -3,-0.562 -2.838,-0.4 -2,-0.4 -2,-2 -3,-2
  Top Layer region: -3,0.562 -2.838,0.4 -2,0.4 -2,2 -3,2
  silkscreen extent -4.5,-3.8 4.5,1.75, body extent -4.25,-3.75 4.25,1.75, height 3.5
LabelSilk_12x12 [mm] "PCA version label, stick-on, 12x12mm"
  silkscreen extent 0,0 12,12, body extent 0,0 12,12, height 0.05
LED_0603_G [mil] "SMD Super Bright LED, GREEN"
  rect 30x32 smd: 1(-27.5,0) 2(27.5,0)
  silkscreen extent -58,-20 48,20, body extent -32,-16 32,16, height 24
LIST_1x2 [mm] "Pin List, 2.54mm through hole"
  rect 1.5x1.5 hole 0.9: 1(-1.27,0)
  round 1.5 hole 0.9: 2(1.27,0)
  body extent -2.54,-1.27 2.44,1.23, height 8.2
LIST_1x3 [mm] "Pin List, 2.54mm through hole"
  rect 1.5x1.5 hole 0.9: 1(-2.54,0)
  round 1.5 hole 0.9: 2(0,0) 3(2.54,0)
  body extent -3.81,-1.27 3.71,1.23, height 8.2
LIST_1x3_SMD [mm] "Pin List, 2.54mm, SMD"
  rect 1.02x2.19 smd: 1(0,1.465) 1(0,-1.465) 2(2.54,-1.465) 2(2.54,1.465) 3(5.08,-1.465) 3(5.08,1.465)
  silkscreen extent -1.27,-1.27 6.35,1.27, body extent -1.27,-2.5 6.35,2.5, height 9.82
NORDIC_LOGO_LYING [mm]
  silkscreen extent -2.57,-2.24 13.7,2.24
Nordic_QFN50P500X500X90-33N [mm] "QFN32 5x5x0.85mm, 0.5mm pitch - Medium Density"
  oval 0.85x0.3 smd: 1(-2.45,1.75) 2(-2.45,1.25) 3(-2.45,0.75) 4(-2.45,0.25) 5(-2.45,-0.25) 6(-2.45,-0.75) 7(-2.45,-1.25) 8(-2.45,-1.75) 17(2.45,-1.75) 18(2.45,-1.25) 19(2.45,-0.75) 20(2.45,-0.25) 21(2.45,0.25) 22(2.45,0.75) 23(2.45,1.25) 24(2.45,1.75)
  oval 0.3x0.85 smd: 9(-1.75,-2.45) 10(-1.25,-2.45) 11(-0.75,-2.45) 12(-0.25,-2.45) 13(0.25,-2.45) 14(0.75,-2.45) 15(1.25,-2.45) 16(1.75,-2.45) 25(1.75,2.45) 26(1.25,2.45) 27(0.75,2.45) 28(0.25,2.45) 29(-0.25,2.45) 30(-0.75,2.45) 31(-1.25,2.45) 32(-1.75,2.45)
  rect 3.5x3.5 smd: 33(0,0)
  silkscreen extent -2.57,-2.57 2.57,2.57, body extent -2.5,-2.5 2.5,2.5, height 0.9
QFN12P40_170X200X55L50X20 [mm] "QFN, 12-Leads, Body 2,1x1,8mm (max), Pitch 0,40mm, IPC Low Density"
  rrect50% 0.72x0.25 smd: 1(-0.64,0.8) 2(-0.64,0.4) 3(-0.64,0) 4(-0.64,-0.4) 5(-0.64,-0.8) 7(0.64,-0.8) 8(0.64,-0.4) 9(0.64,0) 10(0.64,0.4) 11(0.64,0.8)
  rrect50% 0.25x0.72 smd: 6(0,-0.85) 12(0,0.85)
  silkscreen extent -1.47,-1.1 1.01,1.1, body extent -0.85,-1 0.85,1, height 0.55
QFN40P600X600X90-48N [mm] "QFN, 48-Leads, Body 6,0x6,0mm (max), Pitch 0,40mm, IPC Medium Density"
  oval 0.65x0.2 smd mask+0.05: 1(-3.025,2.2) 2(-3.025,1.8) 3(-3.025,1.4) 4(-3.025,1) 5(-3.025,0.6) 6(-3.025,0.2) 7(-3.025,-0.2) 8(-3.025,-0.6) 9(-3.025,-1) 10(-3.025,-1.4) 11(-3.025,-1.8) 12(-3.025,-2.2) 25(3.025,-2.2) 26(3.025,-1.8) 27(3.025,-1.4) 28(3.025,-1) 29(3.025,-0.6) 30(3.025,-0.2) 31(3.025,0.2) 32(3.025,0.6) 33(3.025,1) 34(3.025,1.4) 35(3.025,1.8) 36(3.025,2.2)
  oval 0.2x0.65 smd mask+0.05: 13(-2.2,-3.025) 14(-1.8,-3.025) 15(-1.4,-3.025) 16(-1,-3.025) 17(-0.6,-3.025) 18(-0.2,-3.025) 19(0.2,-3.025) 20(0.6,-3.025) 21(1,-3.025) 22(1.4,-3.025) 23(1.8,-3.025) 24(2.2,-3.025) 37(2.2,3.025) 38(1.8,3.025) 39(1.4,3.025) 40(1,3.025) 41(0.6,3.025) 42(0.2,3.025) 43(-0.2,3.025) 44(-0.6,3.025) 45(-1,3.025) 46(-1.4,3.025) 47(-1.8,3.025) 48(-2.2,3.025)
  rect 4.7x4.7 smd: 49(0,0)
  silkscreen extent -4.02,-3 3,3, body extent -3.02,-3.02 3.02,3.02, height 0.86
RESC0603X03L_C [mm] "Chip Resistor, 2-Leads, Body 0.6x0.3mm, IPC High Density"
  rect 0.27x0.3 smd: 1(-0.285,0) 2(0.285,0)
  body extent -0.3,-0.15 0.3,0.15, height 0.23
RESC1005X04L [mm] "Chip Resistor, 2-Leads, Body 1.0x0.5mm, IPC High Density"
  rect 0.6x0.55 smd mask+0.05: 1(-0.5,0) 2(0.5,0)
  body extent -0.5,-0.25 0.5,0.25, height 0.3
S1751 [mm]
  rect 3.45x1.85 smd: 1(0,0)
  silkscreen extent -2.04,-1.25 2.06,1.25, body extent -1.67,-0.8 1.58,0.85, height 2.05
SD-80259-001 [mm] "USB TYPE C RECEPTACLE, 16 PIN"
  round 0.6 hole 0.6 unplated: 0(-2.89,1.315) 0(2.89,1.315)
  rect 0.6x1.14 smd: A1(-3.2,2.385) A4(-2.4,2.385) A9(2.4,2.385) A12(3.2,2.385)
  rect 0.3x1.14 smd: A5(-1.25,2.385) A6(-0.25,2.385) A7(0.25,2.385) A8(1.25,2.385) B5(1.75,2.385) B6(0.75,2.385) B7(-0.75,2.385) B8(-1.75,2.385)
  oval 0.9x2 hole 0.6 slot 1.7 at 90 deg: SHLD(-4.325,1.795) SHLD(4.325,1.795)
  oval 0.9x1.7 hole 0.6 slot 1.4 at 90 deg: SHLD(-4.325,-2.385) SHLD(4.325,-2.385)
  oval 0.9x2 on Top Paste: ""(-4.32,1.795) ""(4.32,1.795)
  oval 0.9x1.7 on Top Paste: ""(-4.32,-2.385) ""(4.32,-2.385)
  silkscreen extent -4.33,-4.48 4.33,0.47, body extent -4.48,-4.98 4.48,2.74, height 3.26
SEGGER_LOGO_S [mm] "Logo 7.82 mm x 3.84 mm, print overlay"
  silkscreen extent -3.91,-1.92 3.91,1.92
Shunt_2.54mm_Vertical [mm]
  body extent -2.51,-1.24 2.51,1.24, height 9
Solderbridge [mil]
  round 1 smd paste-99999: 1(-13.78,0) 2(13.78,0)
  Top Layer region: 7.49,-19.36 15.76,-15.74 21.55,-8.8 23.62,0 23.62,0 21.55,8.79 15.76,15.74 7.49,19.36 7.49,19.36 6.18,19.31 5.02,18.71 4.22,17.68 3.94,16.4 3.94,16.4 3.94,-16.4 4.22,-17.68 5.02,-18.71 6.18,-19.31 7.49,-19.36
  Top Layer region: -7.49,19.36 -15.76,15.74 -21.55,8.8 -23.62,0 -23.62,0 -21.55,-8.79 -15.76,-15.74 -7.49,-19.36 -7.49,-19.36 -6.18,-19.31 -5.02,-18.71 -4.22,-17.68 -3.94,-16.4 -3.94,-16.4 -3.94,16.4 -4.22,17.68 -5.02,18.71 -6.18,19.31 -7.49,19.36
Solderbridge_0.4#1 [mm]
  round 0.2 smd paste-10: 1(-0.312,0) 2(0.312,0)
  Top Layer region: 0.077,0.553 0.203,0.512 0.335,0.424 0.409,0.351 0.462,0.292 0.521,0.193 0.549,0.099 0.544,-0.122 0.518,-0.193 0.434,-0.33 0.351,-0.411 0.152,-0.536 0.077,-0.559
  Top Layer region: -0.077,-0.553 -0.129,-0.605 -0.205,-0.554 -0.409,-0.351 -0.462,-0.292 -0.521,-0.193 -0.549,-0.099 -0.544,0.122 -0.518,0.193 -0.434,0.33 -0.351,0.411 -0.259,0.469 -0.159,0.556 -0.08,0.565
  Top Layer lines w0.152: -0.156,0.557 ccw(c-0.035,0) -0.312,0.498 ccw(c-0.035,0) -0.45,-0.391 ccw(c-0.035,0) -0.153,-0.558 ; 0.153,0.557 cw(c0.03,0) 0.528,0.279 cw(c0.03,0) 0.153,-0.557
Solderbridge_0.4#2 [mm]
  round 0.2 smd paste-10: 1(-0.312,0) 2(0.312,0)
  Top Layer region: 0.077,0.553 0.203,0.512 0.335,0.424 0.409,0.351 0.462,0.292 0.521,0.193 0.549,0.099 0.544,-0.122 0.518,-0.193 0.434,-0.33 0.351,-0.411 0.152,-0.536 0.077,-0.559
  Top Layer region: -0.077,-0.553 -0.129,-0.605 -0.205,-0.554 -0.409,-0.351 -0.462,-0.292 -0.521,-0.193 -0.549,-0.099 -0.544,0.122 -0.518,0.193 -0.434,0.33 -0.351,0.411 -0.259,0.469 -0.159,0.556 -0.08,0.565
  Top Layer lines w0.152: -0.153,-0.558 cw(c-0.035,0) -0.312,-0.498 cw(c-0.035,0) -0.466,0.373 cw(c-0.035,0) -0.442,0.399 cw(c-0.035,0) -0.408,0.431 cw(c-0.035,0) -0.156,0.557 ; 0.153,-0.557 ccw(c0.03,0) 0.527,-0.279 ccw(c0.03,0) 0.538,-0.259 ccw(c0.03,0) 0.549,-0.237 ccw(c0.03,0) 0.153,0.557
Solderbridge_Shorted [mil]
  round 1 smd paste-99999: 1(-13.78,0) 2(13.78,0)
  Top Layer region: -4.92,3.94 -4.92,-3.94 4.92,-3.94 4.92,3.94
  Top Layer region: -7.49,19.36 -15.76,15.74 -21.55,8.8 -23.62,0 -23.62,0 -21.55,-8.79 -15.76,-15.74 -7.49,-19.36 -7.49,-19.36 -6.18,-19.31 -5.02,-18.71 -4.22,-17.68 -3.94,-16.4 -3.94,-16.4 -3.94,16.4 -4.22,17.68 -5.02,18.71 -6.18,19.31 -7.49,19.36
  Top Layer region: 7.49,-19.36 15.76,-15.74 21.55,-8.8 23.62,0 23.62,0 21.55,8.79 15.76,15.74 7.49,19.36 7.49,19.36 6.18,19.31 5.02,18.71 4.22,17.68 3.94,16.4 3.94,16.4 3.94,-16.4 4.22,-17.68 5.02,-18.71 6.18,-19.31 7.49,-19.36
Solderbridge_SHORTED_0.4 [mm]
  round 0.2 smd paste-10: 1(-0.312,0) 2(0.312,0)
  Top Layer region: -0.077,-0.553 -0.129,-0.605 -0.205,-0.554 -0.409,-0.351 -0.462,-0.292 -0.521,-0.193 -0.549,-0.099 -0.544,0.122 -0.518,0.193 -0.434,0.33 -0.351,0.411 -0.259,0.469 -0.159,0.556 -0.08,0.565
  Top Layer region: 0.077,0.553 0.203,0.512 0.335,0.424 0.409,0.351 0.462,0.292 0.521,0.193 0.549,0.099 0.544,-0.122 0.518,-0.193 0.434,-0.33 0.351,-0.411 0.152,-0.536 0.077,-0.559
  Top Layer lines w0.152: 0.153,0.557 cw(c0.03,0) 0.153,-0.557 ; -0.153,-0.558 cw(c-0.035,0) -0.156,0.557
  Top Layer lines w0.203: 0.363,0 -0.312,0
SON127P600X80_HS-9N [mm] "SON, 8-Leads, Body 5.00x6.00mm, Pitch 1.27mm, Thermal Pad 4.00x3.40mm, IPC Medium Density"
  rect 1.15x0.45 smd: 1(-2.77,1.905) 2(-2.77,0.635) 3(-2.77,-0.635) 4(-2.77,-1.905) 5(2.77,-1.905) 6(2.77,-0.635) 7(2.77,0.635) 8(2.77,1.905)
  rect 3.4x4 smd paste-1.7: 9(0,0)
  silkscreen extent -3.98,-2.6 3.1,2.67, body extent -3.05,-2.55 3.05,2.55, height 0.8
SOT95P280X145-5N [mm] "SOT23, 5-Leads, Body 2,90x2,80mm, Pitch 0,95mm, IPC Medium Density"
  rect 1x0.6 smd: 1(-1.35,0.95) 2(-1.35,0) 3(-1.35,-0.95) 4(1.35,-0.95) 5(1.35,0.95)
  silkscreen extent -1.47,-1.5 0.45,1.92, body extent -1.5,-1.55 1.5,1.55, height 1.45
Switch-PB-6.2x6.3mm-SMD [mm] "6.2×6.5mm TACT Switch, without ground connector"
  rect 2.75x1.4 smd: 1(-3.375,2) 1(3.375,2) 2(-3.375,-2) 2(3.375,-2)
  silkscreen extent -3,-3 3,3, body extent -3.6,-3.1 3.6,3.1, height 2.5
TC2050-IDC-NLFP [mil]
  round 39 hole 39 unplated mask+0.79: 0(-150,0) 0(150,-40) 0(150,40)
  round 31 smd paste-196.85: 1(-100,-25) 2(-50,-25) 3(0,-25) 4(50,-25) 5(100,-25) 6(100,25) 7(50,25) 8(0,25) 9(-50,25) 10(-100,25)
  Top Layer pour cut-out: -100,25 -100,-25 100,-25 100,25
TP_SMD_D0.7mm [mm] "Test point - pad 0.7mm"
  round 0.7 smd paste-5: 1(0,0)
  silkscreen extent -0.63,-0.64 0.63,0.63
TP_SMD_D1.5mm#1 [mm] "Test point - pad 1.5mm"
  round 1.5 smd paste-5: 1(0,0)
  body extent -0.75,-0.75 0.75,0.75, height 0.05
TP_SMD_D1.5mm#2 [mm] "Test point - pad 1.5mm"
  round 1.5 smd paste-5: 1(0,0.01)
  body extent -0.75,-0.75 0.75,0.75, height 0.05
TSSOP6 [mm] "TSSOP6 (SOT-363)"
  rect 0.6x0.6 smd: 1(-0.75,-0.9) 3(0.75,-0.9) 4(0.75,0.9) 6(-0.75,0.9)
  rect 0.4x0.6 smd: 2(0,-0.9) 5(0,0.9)
  silkscreen extent -1.47,-1.07 1,0.45, body extent -1,-1.05 1,1.05, height 0.93
UFDFN50P120X250X55-8N [mm]
  round 0.025 smd: 1(-0.5,0.75) 4(-0.5,-0.75) 5(0.5,-0.75) 8(0.5,0.75)
  rect 0.6x0.2 smd: 2(-0.5,0.25) 3(-0.5,-0.25) 6(0.5,-0.25) 7(0.5,0.25)
  Top Layer region: -0.2,0.65 -0.8,0.65 -0.8,0.85 -0.4,0.85 -0.4,1.05 -0.2,1.05
  Top Layer region: 0.4,0.85 0.8,0.85 0.8,0.65 0.2,0.65 0.2,1.05 0.4,1.05
  Top Layer region: -0.2,-1.05 -0.4,-1.05 -0.4,-0.85 -0.8,-0.85 -0.8,-0.65 -0.2,-0.65
  Top Layer region: 0.8,-0.85 0.4,-0.85 0.4,-1.05 0.2,-1.05 0.2,-0.65 0.8,-0.65
  silkscreen extent -1.08,-1.37 0.6,1.37, body extent -0.6,-1.25 0.6,1.25, height 0.6
WEE_3x4.5mm [mm]
  silkscreen extent -1.47,-2.7 1.47,1.71
XQFN40P180X260X50-16N#1 [mm] "QFN, 16-Leads, Body 1.80x2.60mm, Pitch 0.40mm, IPC Medium Density"
  rect 0.65x0.22 smd paste-0.02 mask+0.035: 1(-0.725,0.6)
  rect 0.55x0.22 smd paste-0.02 mask+0.035: 2(-0.775,0.2) 3(-0.775,-0.2) 4(-0.775,-0.6) 9(0.775,-0.6) 10(0.775,-0.2) 11(0.775,0.2) 12(0.775,0.6)
  rect 0.22x0.55 smd paste-0.02 mask+0.035: 5(-0.6,-1.175) 6(-0.2,-1.175) 7(0.2,-1.175) 8(0.6,-1.175) 13(0.6,1.175) 14(0.2,1.175) 15(-0.2,1.175) 16(-0.6,1.175)
  silkscreen extent -1.36,-1.37 0.97,1.37, body extent -0.9,-1.3 0.9,1.3, height 0.55
XQFN40P180X260X50-16N#2 [mm] "QFN, 16-Leads, Body 1.80x2.60mm, Pitch 0.40mm, IPC Medium Density"
  rect 0.65x0.22 smd paste-0.02 mask+0.05: 1(-0.725,0.6)
  rect 0.55x0.22 smd paste-0.02 mask+0.03: 2(-0.775,0.2) 3(-0.775,-0.2) 4(-0.775,-0.6) 9(0.775,-0.6) 10(0.775,-0.2) 11(0.775,0.2) 12(0.775,0.6)
  rect 0.22x0.55 smd paste-0.02 mask+0.03: 5(-0.6,-1.175) 6(-0.2,-1.175) 7(0.2,-1.175) 8(0.6,-1.175) 13(0.6,1.175) 14(0.2,1.175) 15(-0.2,1.175) 16(-0.6,1.175)
  silkscreen extent -1.36,-1.37 0.97,1.37, body extent -0.9,-1.3 0.9,1.3, height 0.55
XTAL_2012 [mm] "XTAL SMD 2.0 x 1.2 mm"
  rect 0.75x1.4 smd: 1(-0.725,0) 2(0.725,0)
  silkscreen extent -0.17,-0.6 0.17,0.6, body extent -1,-0.61 1,0.61, height 0.6

## Part data
C1 C2: library part C0201-2µ2-2.5V-X6T-GRM033D80E225ME47D, "Capacitor, Ceramic, 2.2µF 2.5V X6T 0201,±20%", Manufacturer=Murata, Manufacturer Part Number=GRM033R61A225KE47, Part number IPS=N.A., Part number NEMS=100200527, Supplier Part Number 1=81-GRM033D80E225ME7D, Artikkelnr Noca=N.A., Author=stl1, Component Class=Capacitors, Component Status=Active, ComponentLink1Description=Datasheet, ComponentLink1URL=https://www.murata.com/products/productdetail?partno=GRM033D80E225ME47%23, ComponentLink2Description="Supplier link", ComponentLink2URL=N.A., Footprint Doc=0201, HelpURL=N.A., LatestRevisionDate=2022-02-27, Note="2.5V, 20%, X6T", Pad Count=2, Part Number=C0201-2µ2-2.5V-X6T-GRM033D80E225ME47D, Part number Norautron=N.A., PartId=100200527, Published=2022-02-27, Supplier 1=Mouser, Supplier 2=Digi-Key, Supplier Part Number 2=490-18653-1-ND
C3: library part C0402-10µF-6.3V-X6S, "Capacitor, X6S, ±20%, 6.3V", Manufacturer=N.A., Part number NEMS=100200478, Artikkelnr Noca=N.A., Author=getr, Component Class=Capacitors, Component Status=Active, ComponentLink1Description=Datasheet, ComponentLink1URL=N.A., ComponentLink2Description="Supplier link", ComponentLink2URL=N.A., Footprint Doc=0402, HelpURL=N.A., LatestRevisionDate=2021-06-25, Manufacturer Part Number=N.A., Note=6.3V, Pad Count=2, Part Number=C0402-10µF-6.3V-X6S, Part number IPS=N.A., Part number Norautron=N.A., PartId=100200478, Published=2021-06-25, Supplier 1=N.A., Supplier 2=N.A., Supplier Part Number 1=N.A., Supplier Part Number 2=N.A.
C4 C7 C8 C10 C11 C13 C14 C15 C18 C20 C21 C22 C25 C29 C34 C35 C36 C37 C44 C46 C48 C49 C52 C53 C55 C56 C57 C62 C63 C64 C65 C66 C69 C70 C72 C73 C74 C75 C76 C77 C78 C79: library part C0201-100n, "Capacitor, X5R, ±10%", Manufacturer=N.A., Part number IPS="00000001248, 00000002505", Part number NEMS=100200078, Part number Norautron=262071862, Artikkelnr Noca=N.A., Author=rsk, Component Class=Capacitors, Component Status=Active, ComponentLink1Description=Datasheet, ComponentLink1URL=N.A., ComponentLink2Description="Supplier link", ComponentLink2URL=N.A., Footprint Doc=0201, HelpURL=N.A., LatestRevisionDate=2017-11-09, Manufacturer Part Number=N.A., Note=16V, Pad Count=2, Part Number=C0201-100n, PartId=100200078, Published=2014-11-13, Supplier 1=N.A., Supplier 2=N.A., Supplier Part Number 1=N.A., Supplier Part Number 2=N.A.
C5 C33: library part C0201-2n2, "Capacitor, X7R, ±10%, 10V", Manufacturer=N.A., Part number IPS=00000001778, Part number NEMS=100200060, Part number Norautron=26470002, Artikkelnr Noca=N.A., Author=rsk, Component Class=Capacitors, Component Status=Active, ComponentLink1Description=Datasheet, ComponentLink1URL=N.A., ComponentLink2Description="Supplier link", ComponentLink2URL=N.A., Footprint Doc=0201, HelpURL=N.A., LatestRevisionDate=2014-11-13, Manufacturer Part Number=N.A., Note=10V, Pad Count=2, Part Number=C0201-2n2, PartId=100200060, Published=2014-11-13, Supplier 1=N.A., Supplier 2=N.A., Supplier Part Number 1=N.A., Supplier Part Number 2=N.A.
C6: library part C0201-1.5p-25V-NP0-GJM0335C1E1R5WB01, "Capacitor, NP0, ±0.05pF, 25V, High Q", Manufacturer=Murata, Manufacturer Part Number=GJM0335C1E1R5WB01, Part number IPS=N.A., Part number NEMS=100200477, Supplier Part Number 1=490-11176-2-ND, Artikkelnr Noca=N.A., Author=masi, Component Class=Capacitors, Component Status=Active, ComponentLink1Description=Datasheet, ComponentLink1URL=https://search.murata.co.jp/Ceramy/image/img/A01X/G101/ENG/GJM0335C1E1R5WB01-01.pdf, ComponentLink2Description="Supplier link", ComponentLink2URL=N.A., Footprint Doc=0201, HelpURL=https://www.murata.com/products/productdetail?partno=GJM0335C1E1R5WB01%23, LatestRevisionDate=2021-06-15, Note=25V, Pad Count=2, Part Number=C0201-1.5p-25V-NP0-GJM0335C1E1R5WB01, Part number Norautron=N.A., PartId=100200477, Published=2021-06-15, Supplier 1=Digi-Key, Supplier 2=Mouser, Supplier Part Number 2=81-GJM0335C1E1R5WB1D
C9: library part C0201-2.0p-HQ-Murata, "Capacitor, NP0, ±0.05pF, 25V", Manufacturer=Murata, Manufacturer Part Number=GJM0335C1E2R0WB01, Part number IPS=00000001775, Part number NEMS=100200419, Part number Norautron=N.A., Artikkelnr Noca=N.A., Author=rsk, Component Class=Capacitors, Component Status=Active, ComponentLink1Description=Datasheet, ComponentLink1URL=N.A., ComponentLink2Description="Supplier link", ComponentLink2URL=N.A., Footprint Doc=0201, HelpURL=https://psearch.en.murata.com/capacitor/product/GJM0335C1E2R0WB01%23.html, LatestRevisionDate=2018-10-25, Note=25V, Pad Count=2, Part Number=C0201-2.0p-HQ-Murata, PartId=100200419, Published=2018-10-25, Supplier 1=N.A., Supplier 2=N.A., Supplier Part Number 1=N.A., Supplier Part Number 2=N.A.
C12 C30 C67: library part C0201-10n, "Capacitor, X7R, ±10%", Manufacturer=N.A., Part number IPS=00000003480, Part number NEMS=100200067, Part number Norautron=26621779, Artikkelnr Noca=N.A., Author=rsk, Component Class=Capacitors, Component Status=Active, ComponentLink1Description=Datasheet, ComponentLink1URL=N.A., ComponentLink2Description="Supplier link", ComponentLink2URL=N.A., Footprint Doc=0201, HelpURL=N.A., LatestRevisionDate=2017-11-09, Manufacturer Part Number=N.A., Note=10V, Pad Count=2, Part Number=C0201-10n, PartId=100200067, Published=2014-11-13, Supplier 1=N.A., Supplier 2=N.A., Supplier Part Number 1=N.A., Supplier Part Number 2=N.A.
  C67: Assembly="Not Mounted"
C16 C28 C31 C32 C39 C45 C50 C51 C68: library part C0402-1µ0-6.3V-X5R-10%, "Capacitor, X5R, ±10%, 6.3V", Manufacturer=N.A., Part number NEMS=100200498, Part number Norautron=26207137, Artikkelnr Noca=N.A., Author=rubr, Component Class=Capacitors, Component Status=Active, ComponentLink1Description=Datasheet, ComponentLink1URL=N.A., ComponentLink2Description="Supplier link", ComponentLink2URL=N.A., Footprint Doc=0402, HelpURL=N.A., LatestRevisionDate=2022-01-27, Manufacturer Part Number=N.A., Note=6.3V, Pad Count=2, Part Number=C0402-1µ0-6.3V-X5R-10%, Part number IPS=N.A., PartId=100200498, Published=2022-01-27, Supplier 1=N.A., Supplier 2=N.A., Supplier Part Number 1=N.A., Supplier Part Number 2=N.A.
C17 C19: library part C0402-300p, "Capacitor, C0G, ±5%, 50V", Manufacturer=N.A., Part number IPS=00000007788, Part number NEMS=100200155, Supplier Part Number 1=490-3234-1-ND, Artikkelnr Noca=20020004, Author=rsk, Component Class=Capacitors, Component Status=Active, ComponentLink1Description=Datasheet, ComponentLink1URL=N.A., ComponentLink2Description="Supplier link", ComponentLink2URL=N.A., Footprint Doc=0402, HelpURL=N.A., LatestRevisionDate=2020-10-13, Manufacturer Part Number=N.A., Note=50V, Pad Count=2, Part Number=C0402-300p, Part number Norautron=N.A., PartId=100200155, Published=2015-05-29, Supplier 1=Digi-Key, Supplier 2=N.A., Supplier Part Number 2=N.A.
C23: library part C0402-2µ2-10V, "Capacitor, X5R, ±10%", Manufacturer=N.A., Part number NEMS=100200376, Supplier Part Number 1=490-10451-1-ND, Artikkelnr Noca=N.A., Author=rsk, Component Class=Capacitors, Component Status=Active, ComponentLink1Description=Datasheet, ComponentLink1URL=N.A., ComponentLink2Description="Supplier link", ComponentLink2URL=N.A., Footprint Doc=0402, HelpURL=N.A., LatestRevisionDate=2020-10-13, Manufacturer Part Number=N.A., Note=10V, Pad Count=2, Part Number=C0402-2µ2-10V, Part number IPS=N.A., Part number Norautron=N.A., PartId=100200376, Published=2016-08-22, Supplier 1=Digi-Key, Supplier 2=N.A., Supplier Part Number 2=N.A.
C24 C26 C27: library part C0603-10µ-10V-X7T-GRM188D71A106MA73, "Capacitor, X7T, ±20%, 10V", Manufacturer=Murata, Manufacturer Part Number=GRM188D71A106MA73, Part number IPS=00000004696, Part number NEMS=100200414, Part number Norautron=N.A., Supplier Part Number 1=490-7200-1-ND, Artikkelnr Noca=N.A., Author=rsk, Component Class=Capacitors, Component Status=Active, ComponentLink1Description=Datasheet, ComponentLink1URL=N.A., ComponentLink2Description="Supplier link", ComponentLink2URL=N.A., Footprint Doc=0603, HelpURL=https://no.mouser.com/datasheet/2/281/murata_03052018_GRM_Series_1-1310166.pdf, LatestRevisionDate=2021-07-22, Note=10VDC, Pad Count=2, Part Number=C0603-10µ-10V-X7T-GRM188D71A106MA73, PartId=100200414, Published=2018-09-11, Supplier 1=Digi-Key, Supplier 2=Mouser, Supplier Part Number 2=81-GRM188D71A106MA3D
C38: library part C0201-1.4p-25V-GJM0335C1E1R4WB01D, "Capacitor, C0G, ±0.05pF, 25V", Manufacturer=Murata, Manufacturer Part Number=GJM0335C1E1R4WB01D, Part number IPS=N.A., Part number NEMS=100200553, Supplier Part Number 1=490-GJM0335C1E1R4WB01DTR-ND, Artikkelnr Noca=N.A., Author=stl1, Component Class=Capacitors, Component Status=Active, ComponentLink1Description=Datasheet, ComponentLink1URL=https://www.murata.com/products/productdetail?partno=GJM0335C1E1R4WB01%23, ComponentLink2Description="Supplier link", ComponentLink2URL=N.A., Footprint Doc=0201, HelpURL=N.A., LatestRevisionDate=2023-05-30, Note=25V, Pad Count=2, Part Number=C0201-1.4p-25V-GJM0335C1E1R4WB01D, Part number Norautron=N.A., PartId=100200553, Published=2023-05-30, Supplier 1=Digi-Key, Supplier 2=Mouser, Supplier Part Number 2=81-GJM0335C1E1R4WB1D